# Allegro board A527_draft_V1_0.brd
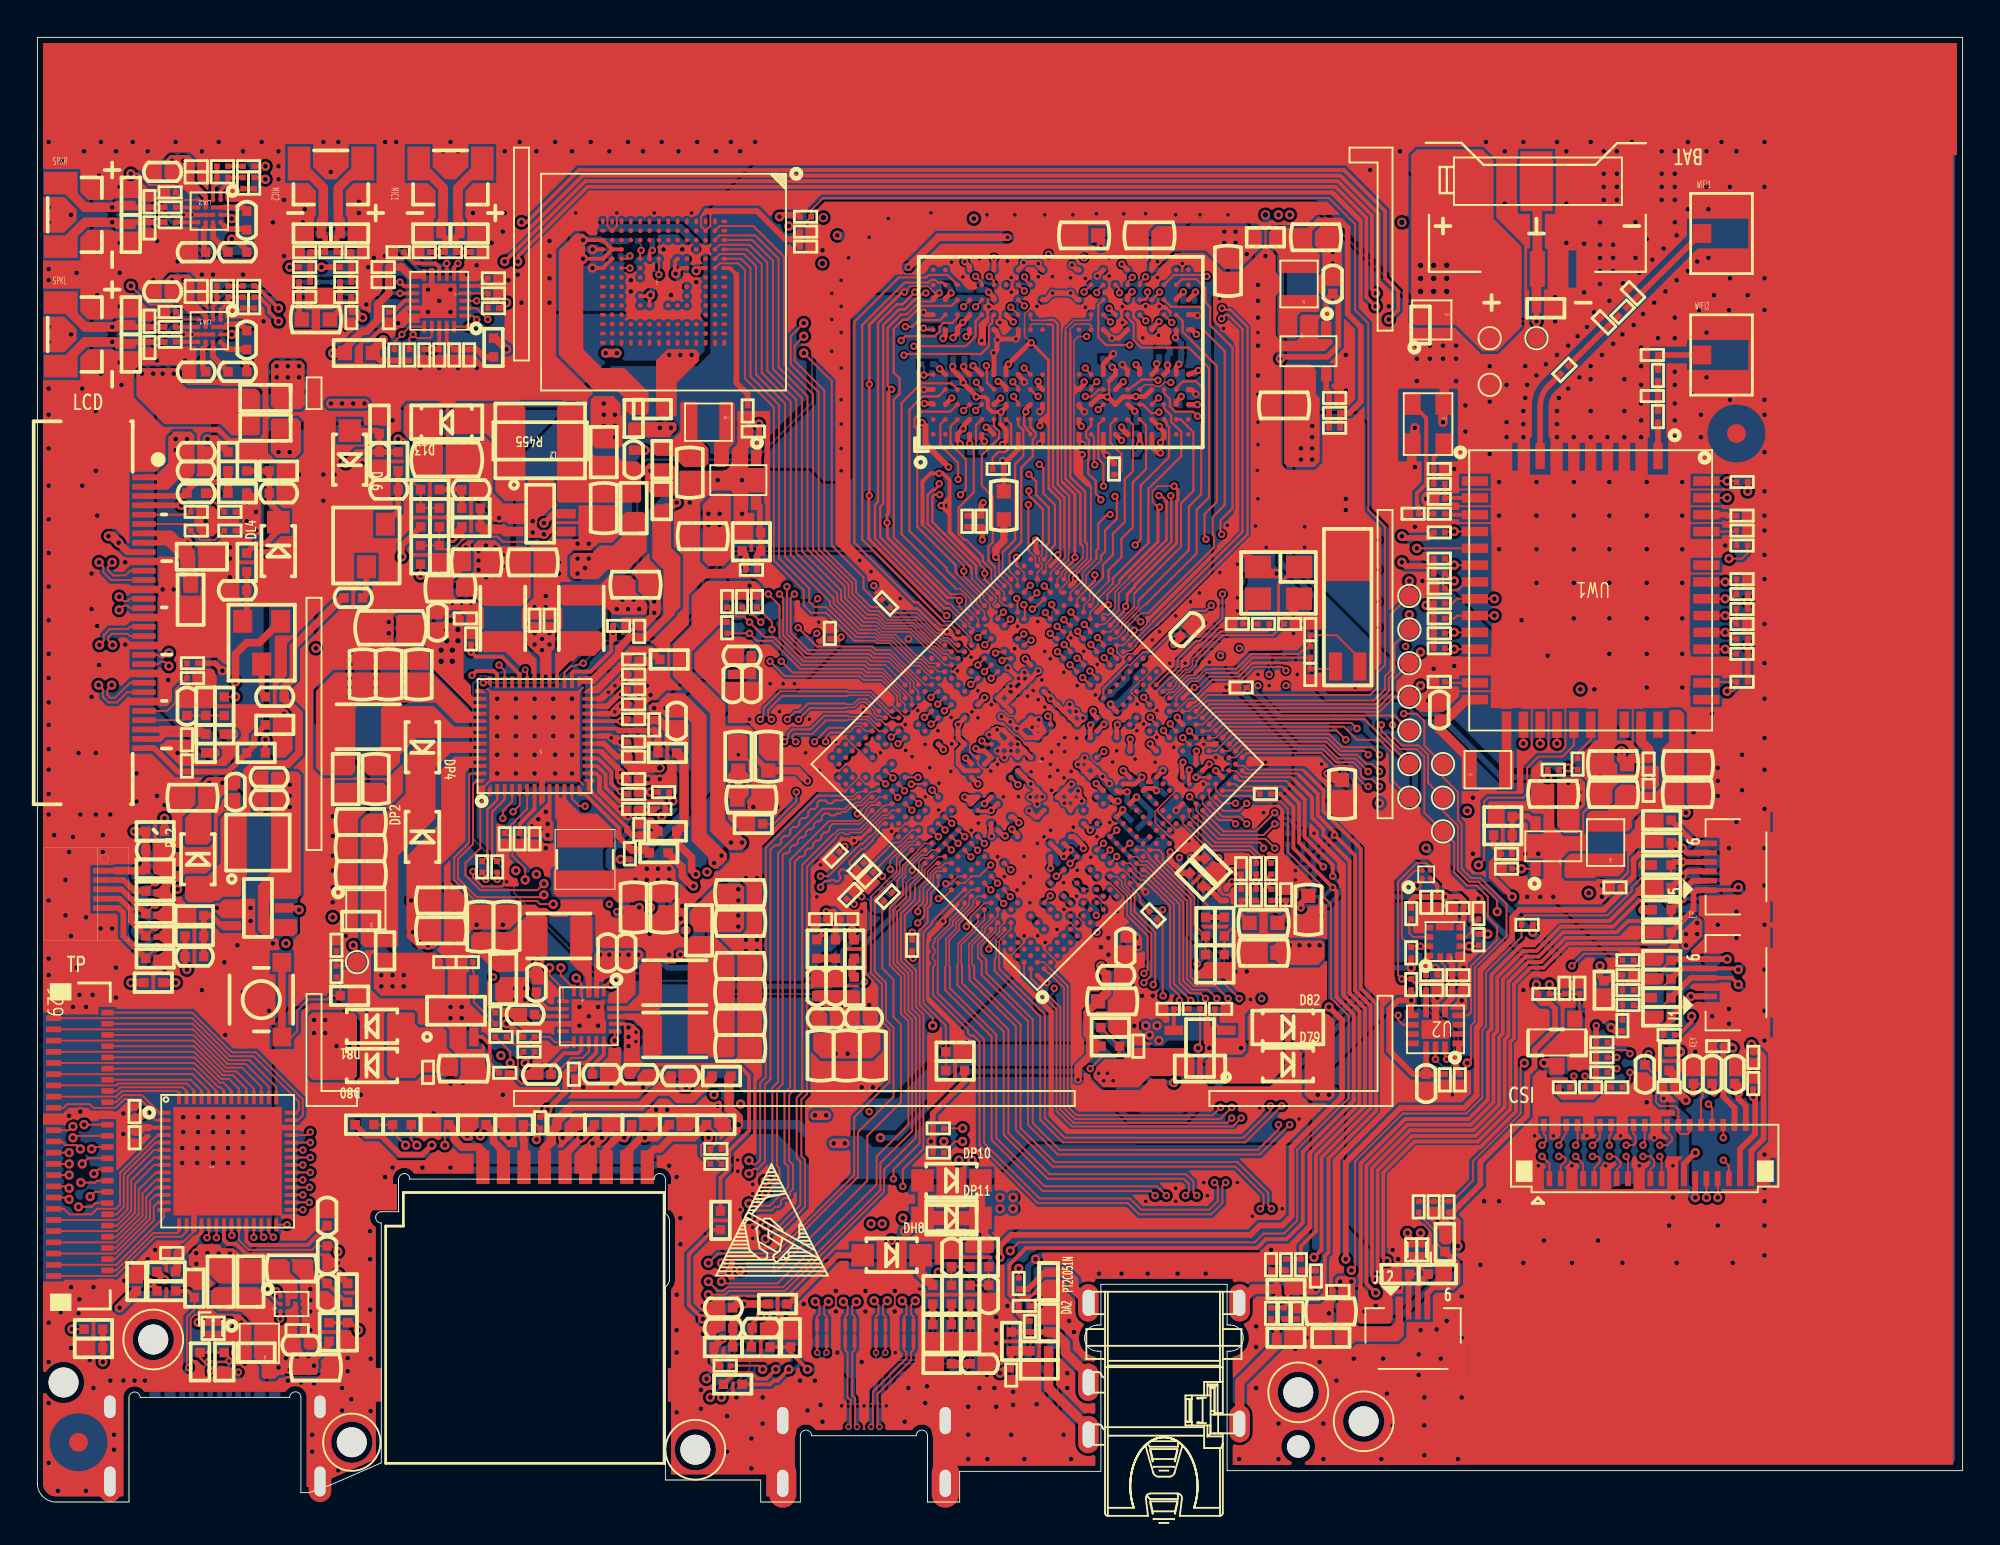
[diagram p0: board, top side]
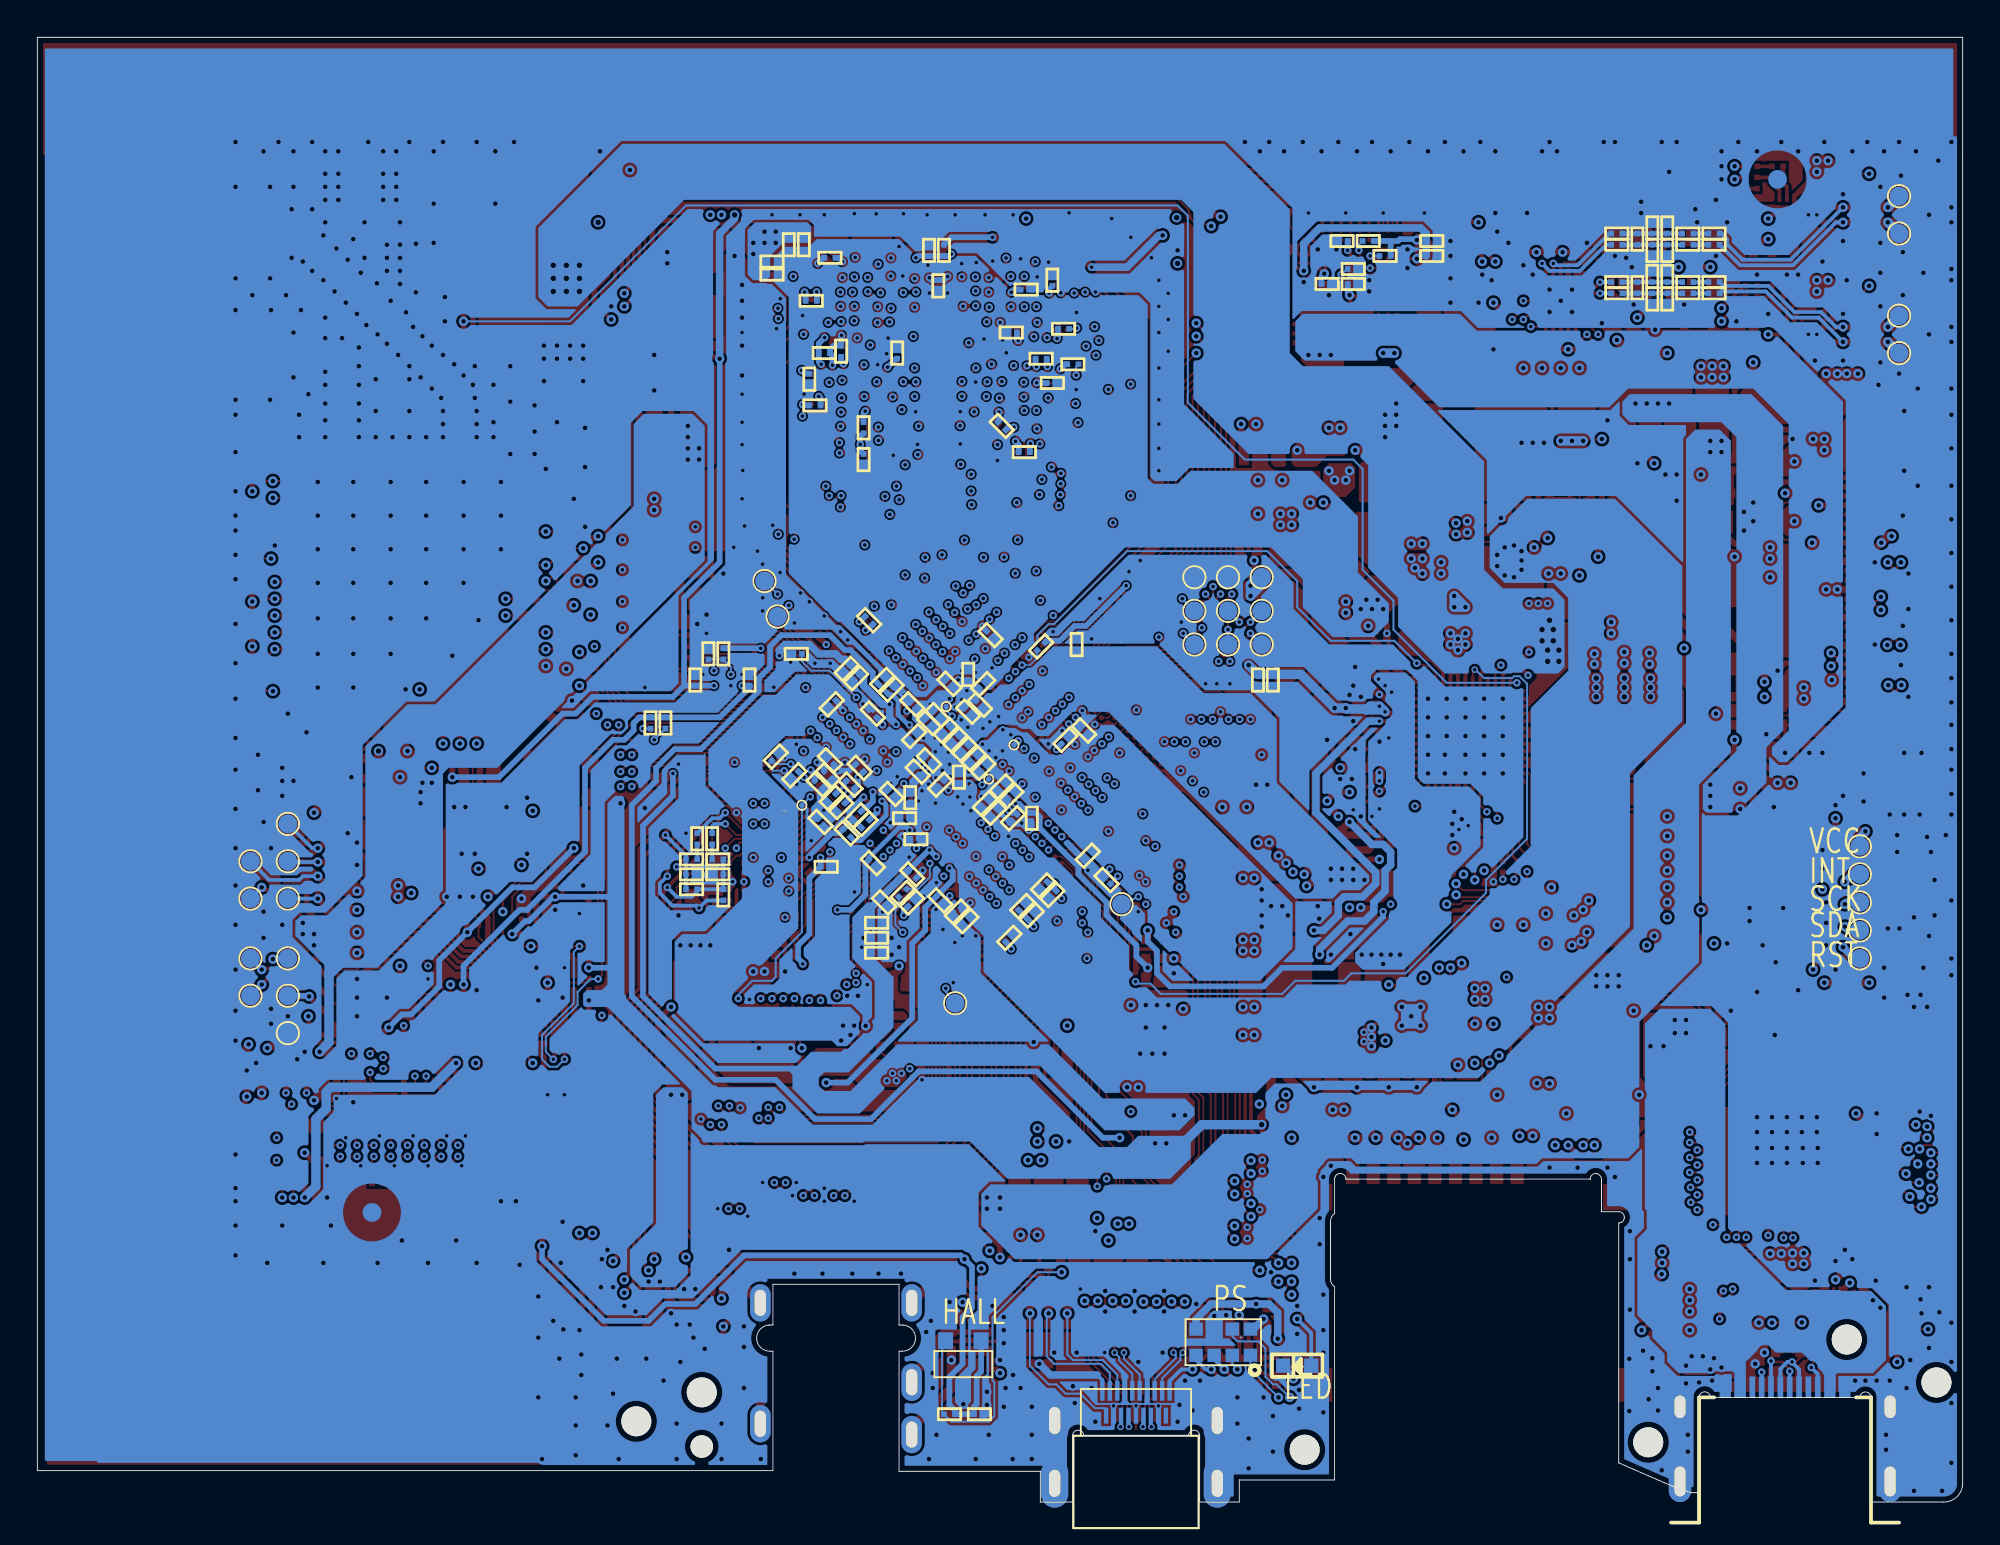
[diagram p1: board, bottom side, seen from below]

Outline 103 x 78.4 mm; copper layers: TOP, ART02, ART03, ART04, ART05, BOTTOM. Coordinates in mm from the lower left corner of the outline.
Outline path: 0,71.9 0,1 arc(0.29,0.29) 1,0 4.9,0 4.9,5.6 arc(5.2,5.89) 5.5,5.6 13.5,5.6 arc(13.8,5.9) 14.1,5.6 14.1,0.5 14.52,0.5 15.72,0.93 18.4,2.1 18.4,14.94 arc(18.19,15.03) 18.1,15.24 arc(18.19,15.45) 18.4,15.54 19.32,15.54 19.32,17.28 arc(19.4,17.48) 19.6,17.58 arc(19.82,17.52) 19.92,17.3 19.92,17.28 33,17.28 33,17.31 arc(33.09,17.51) 33.29,17.58 arc(33.51,17.5) 33.6,17.28 33.6,15.44 arc(33.76,15.26) 33.82,15.03 33.82,11.94 arc(33.76,11.7) 33.6,11.52 33.6,1.18 38.7,1.18 38.7,0 40.82,0 40.82,3.55 arc(41.09,3.85) 41.41,3.6 arc(41.42,3.58) 41.42,3.55 47.02,3.55 arc(47.05,3.68) 47.14,3.79 arc(47.45,3.82) 47.62,3.55 47.62,0 49.34,0 49.34,1.64 56.9,1.64 56.9,8.07 56.72,8.07 arc(56.02,8.75) 56.66,9.47 56.72,9.47 56.9,9.47 56.9,11.66 63.65,11.66 63.65,9.48 63.81,9.48 63.82,9.47 arc(64.52,8.77) 63.82,8.07 63.65,8.07 63.65,1.68 103,1.68 103,78.4 0,78.4 0,71.9

## Design rules (mm)
net group DIFFPAIR9: nets USB0-DM USB0-DP
net group DIFFPAIR15: nets USB1-DM USB1-DP
net group DIFFPAIR17: nets MCSIB-D1N MCSIB-D1P
net group DIFFPAIR18: nets MCSIA-D1N MCSIA-D1P
net group DIFFPAIR21: nets MCSIA-D0N MCSIA-D0P
net group DIFFPAIR23: nets MCSIB-D0N MCSIB-D0P
net group DIFFPAIR24: nets HTX2N HTX2P
net group DIFFPAIR25: nets HTX1N HTX1P
net group DIFFPAIR26: nets HTX0N HTX0P
net group DIFFPAIR27: nets HTXCN HTXCP
net group DIFFPAIR28: nets MCSIA-CKN MCSIA-CKP
net group DIFFPAIR29: nets MCSIC-D0N MCSIC-D0P
net group DIFFPAIR30: nets MCSIC-D1N MCSIC-D1P
net group DIFFPAIR31: nets MCSIC-CKN MCSIC-CKP
net group DIFFPAIR32: nets MIPI-DSI1-DN3 MIPI-DSI1-DP3
net group DIFFPAIR33: nets MIPI-DSI1-DN2 MIPI-DSI1-DP2
net group DIFFPAIR34: nets MIPI-DSI1-CKN MIPI-DSI1-CKP
net group DIFFPAIR35: nets MIPI-DSI1-DN1 MIPI-DSI1-DP1
net group DIFFPAIR36: nets MIPI-DSI1-DN0 MIPI-DSI1-DP0
net group DIFFPAIR37: nets N1092981 N1092985
net group DIFFPAIR38: nets D+ D-
net group SDQS0: nets SDQS0N SDQS0P
net group SDQS1: nets SDQS1N SDQS1P
net group SDQS2: nets SDQS2N SDQS2P
net group SDQS3: nets SDQS3N SDQS3P

## Placement (name value [footprint] x y rotation side)
BL1  GZ1005D471CTF  [L0402]  6.3 35.9 180 top
C1  2.2uF  [C0201]  57.3 43.5 135 bottom
C2  100nF  [C0201]  57.8 44 135 bottom
C3  22uF  [C0603]  37.6 32.6 0 top
C4  2.2uF  [C0201]  52.9 39.8 315 bottom
C5  2.2uF  [C0201]  47 41.3 45 bottom
C6  100nF  [C0201]  50.9 37.8 315 bottom
C7  22uF  [C0603]  37.6 31 0 top
C8  1uF  [C0201]  52.4 39.3 315 bottom
C9  2.2uF  [C0201]  46.8 34.6 315 bottom
C10  NC/100nF  [C0201]  51.4 38.3 315 bottom
C11  22uF  [C0603]  37.5 39.9 90 top
C12  22uF  [C0603]  38.2 37.6 0 top
C13  2.2uF  [C0201]  53.2 42.3 45 bottom
C14  2.2uF  [C0201]  52.57 42.67 45 bottom
C15  1uF  [C0201]  47.4 45.9 90 bottom
C16  NC/1uF  [C0201]  54.4 41.3 315 bottom
C17  2.2uF  [C0201]  53.9 40.8 315 bottom
C18  NC/100nF  [C0201]  53.4 40.3 315 bottom
C19  100nF  [C0201]  37.7 44 270 bottom
C20  100nF  [C0201]  58.3 42.2 45 bottom
C21  1uF  [C0201]  59.2 44.1 315 bottom
C22  100nF  [C0201]  59.7 44.6 315 bottom
C23  1nF  [C0201]  64.4 43.6 180 top
C24  1nF  [C0201]  67.1 45.4 90 bottom
C25  22uF  [C0603]  44.7 23.9 270 top
C26  2.2uF  [C0201]  53.3 31.1 315 bottom
C27  2.2uF  [C0201]  53.8 31.6 315 bottom
C28  NC/100nF  [C0201]  52.3 37.4 135 bottom
C29  NC/100nF  [C0201]  51.8 36.9 135 bottom
C30  18pF-C0G  [C0201]  67 47 0 top
C31  22pF-C0G  [C0201]  68.1 46.7 90 top
C32  22uF  [C0603]  41.9 23.9 270 top
C33  100nF  [C0201]  49.8 31.4 315 bottom
C34  18pF-C0G  [C0201]  64.2 47 180 top
C35  22pF-C0G  [C0201]  68.1 44.3 270 top
C36  22uF  [C0603]  43.3 23.9 270 top
C37  2.2uF  [C0201]  56.3 37.7 90 bottom
C38  22uF  [C0603]  22.1 48.9 180 top
C39  NC/2.2uF  [C0201]  53.7 38.8 90 bottom
C40  2.2uF  [C0201]  56 35.48 0 bottom
C41  NC/100nF  [C0201]  54.7 38.4 135 bottom
C42  2.2uF  [C0201]  56.6 36.6 0 bottom
C43  22uF  [C0603]  65.6 29.4 180 top
C44  2.2uF  [C0201]  55.9 39.1 225 bottom
C45  2.2uF  [C0201]  57.3 37.9 225 bottom
C46  2.2uF  [C0201]  55.3 39.7 225 bottom
C47  2.2uF  [C0201]  56.1 41 135 bottom
C48  100nF  [C0201]  42.4 46.5 90 top
C49  10uF  [C0603]  39.1 39.9 90 top
C50  100nF  [C0201]  48 40.8 135 bottom
C51  100nF  [C0201]  36.9 44 270 bottom
C52  100nF  [C0201]  54.7 32.2 225 bottom
C54  100nF  [C0201]  58.3 34.2 225 bottom
C55  1uF  [C0201]  41.9 31.2 180 top
C56  100nF  [C0201]  43.3 31.2 0 top
C57  100nF  [C0201]  56.2 33.6 225 bottom
C58  100nF  [C0201]  58.1 30.2 180 bottom
C59  100nF  [C0201]  64.9 44 90 bottom
C60  100nF  [C0201]  67.8 44 90 bottom
C61  100nF  [C0201]  60.8 34 180 bottom
C62  2.2uF  [C0201]  60.6 39.7 45 bottom
C63  2.2uF  [C0201]  60 37.2 315 bottom
C64  470nF  [C0201]  60.7 38.9 225 bottom
C65  470nF  [C0201]  61.2 38.4 225 bottom
C66  470nF  [C0201]  60.5 37.7 315 bottom
C67  470nF  [C0201]  59.7 35.8 45 bottom
C68  2.2uF  [C0201]  59.15 36.75 315 bottom
C69  10uF  [C0603]  69.8 37.9 270 top
C70  2.2uF  [C0201]  62.5 38.9 315 bottom
C71  2.2uF  [C0201]  63.5 39.9 135 bottom
C72  100nF  [C0201]  46.8 29.8 270 top
C73  100nF  [C0201]  49.8 36.6 270 bottom
C78  1uF  [C0201]  58.1 31 180 bottom
C79  1uF  [C0201]  57.7 32.1 225 bottom
C80  100nF  [C0201]  56.2 32.1 135 bottom
C81  100nF  [C0201]  58.1 29.4 180 bottom
C82  1uF  [C0201]  51 30.2 315 bottom
C83  1uF  [C0201]  50.3 31.9 315 bottom
C84  100nF  [C0201]  49.2 33 135 bottom
C85  100nF  [C0201]  48.7 32.5 135 bottom
C90  1nF  [C0201]  85.1 28.2 0 top
C91  10nF  [C0201]  76 27.4 0 top
C92  100nF  [C0201]  75.3 22.6 270 top
C93  2.2uF  [C0402]  74.3 22.9 270 top
C94  100nF  [C0201]  52.6 4.7 180 bottom
C95  NC/2.2uF  [C0402]  37.2 9.3 180 top
C96  1uF  [C0201]  74.3 32.1 270 top
C97  100nF  [C0201]  74.9 32.1 270 top
C98  NC/2.2uF  [C0402]  37.2 10.4 180 top
C100  100nF  [C0201]  76 28.2 0 top
C101  100nF  [C0201]  76 31.8 180 top
C102  NC/100nF  [C0201]  50.8 36.6 315 bottom
C103  100nF  [C0201]  60.5 42.7 135 bottom
C104  100nF  [C0402]  61.15 46.35 45 top
C105  10uF  [C0603]  57.5 26.8 0 top
C106  100nF  [C0402]  57.2 28.2 0 top
C107  100nF  [C0402]  58.2 30.2 270 top
C108  1uF  [C0402]  43.7 25.9 0 top
C109  1uF  [C0402]  41.7 27.1 90 top
C110  100nF  [C0402]  42.7 27.1 90 top
C111  100nF  [C0402]  42.7 25.9 180 top
C112  100nF  [C0402]  34.2 42.3 270 top
C113  100nF  [C0402]  38.2 44.3 270 top
C114  1uF  [C0402]  38.2 45.3 180 top
C115  1uF  [C0402]  37.2 44.3 270 top
C133  2.2uF  [C0201]  58.7 36.3 315 bottom
C651  0.1uF/50V  [C0402]  9 55.2 180 top
CA1  2.2uF  [C0603]  68 31.7 270 top
CA2  100nF  [C0201]  66.9 35.5 270 bottom
CA3  33pF  [C0201]  68 32.8 0 bottom
CA4  100nF  [C0201]  67.7 35.5 270 bottom
CA5  100nF  [C0201]  66.7 10.1 270 top
CA6  100nF  [C0201]  67.6 12.7 270 top
CA7  NC/33pF  [C0201]  68 33.6 180 bottom
CA8  1nF  [C0201]  66.6 33.6 0 bottom
CA9  NC/100nF  [C0201]  8.5 71.5 0 top
CA10  2.2uF/10V  [C0402]  10.2 66.9 0 top
CA11  2.2uF/10V  [C0402]  11.2 68.1 90 top
CA12  4.7uF/10V  [C0402]  7.2 64.8 180 top
CA13  100nF  [C0201]  8.5 65.1 0 top
CA14  NC/100nF  [C0201]  8.5 64.5 0 top
CA15  2.2uF/10V  [C0402]  11.2 61.7 90 top
CA16  4.7uF/10V  [C0402]  7.2 71.2 180 top
CA17  100nF  [C0201]  8.5 70.9 0 top
CA18  2.2uF/10V  [C0402]  10.2 60.5 0 top
CA19  4.7uF-10V  [C0402]  8 60.5 0 top
CA20  4.7uF-10V  [C0402]  8 66.9 0 top
CA21  100nF  [C0201]  11.3 65.1 0 top
CA22  100nF  [C0201]  11.3 71.5 0 top
CA23  100nF  [C0201]  11.6 64.2 90 top
CA24  100nF  [C0201]  11.6 70.6 90 top
CA25  220pF  [C0201]  9.9 64.5 180 top
CA26  NC/1nF  [C0201]  6 68.2 270 top
CA27  NC/1nF  [C0201]  6 69.6 90 top
CA28  220pF  [C0201]  9.9 70.9 180 top
CA29  NC/1nF  [C0201]  6 61.8 270 top
CA30  NC/1nF  [C0201]  6 63.2 90 top
CA31  33pF  [C0201]  23.5 66.9 180 top
CA32  1uF  [C0201]  64.4 33.9 270 top
CA33  1uF  [C0201]  16.8 63.4 90 top
CA34  33pF  [C0201]  17.1 66.9 180 top
CA35  100nF  [C0201]  65.2 33.9 270 top
CA36  100nF  [C0201]  16.5 66.1 0 top
CA37  100pF  [C0201]  22.1 66.9 180 top
CA38  10uF  [C0603]  65.6 31 0 top
CA39  100pF  [C0201]  15.7 66.9 180 top
CA40  10uF  [C0603]  14.9 63.3 180 top
CA41  100nF  [C0201]  66 33.9 270 top
CA42  100nF  [C0201]  14.3 66.1 0 top
CA43  33pF  [C0201]  20.7 66.9 180 top
CA44  33pF  [C0201]  14.3 66.9 180 top
CA45  1uF  [C0201]  22.3 61.4 270 top
CA46  100nF  [C0201]  23.1 61.4 270 top
CA47  1uF  [C0201]  21.5 61.4 270 top
CA48  100nF  [C0201]  20.7 61.4 270 top
CA49  100nF  [C0201]  24.4 64.7 0 top
CA50  1uF  [C0201]  24.4 65.5 0 top
CA51  1uF  [C0201]  18.8 63.4 270 top
CA52  1uF  [C0201]  19.3 66.9 180 top
CA53  1uF  [C0201]  18.5 66.1 180 top
CA54  100nF  [C0201]  18.5 65.3 180 top
CA55  10nF  [C0201]  16.6 68.2 270 bottom
CA56  470nF  [C0201]  18.5 67.9 0 bottom
CA57  0R  [C0201]  13.3 67.9 0 bottom
CA58  NC  [C0201]  17.4 67.6 270 bottom
CA59  470nF  [C0201]  18.5 67.3 0 bottom
CA60  0R  [C0201]  13.3 67.3 0 bottom
CA61  10nF  [C0201]  16.6 67 270 bottom
CA62  10nF  [C0201]  15.8 65.6 270 bottom
CA63  470nF  [C0201]  18.5 65.3 0 bottom
CA64  0R  [C0201]  13.3 65.3 0 bottom
CA65  NC  [C0201]  17.4 65 270 bottom
CA66  470nF  [C0201]  18.5 64.7 0 bottom
CA67  0R  [C0201]  13.3 64.7 0 bottom
CA68  10nF  [C0201]  15.8 64.4 270 bottom
CC1  4.7uF  [C0402]  33.9 22.8 0 top
CD1  10uF  [C0603]  51.7 53.35 270 top
CD2  2.2uF  [C0201]  54.8 65.1 90 bottom
CD3  2.2uF  [C0201]  48.7 59.9 0 bottom
CD4  2.2uF  [C0201]  61.7 60.1 90 bottom
CD5  2.2uF  [C0201]  50.9 62.6 180 bottom
CD6  2.2uF  [C0201]  58.8 55.8 90 bottom
CD7  2.2uF  [C0201]  57 61.5 270 bottom
CD8  2.2uF  [C0201]  60.6 66.6 0 bottom
CD9  100nF  [C0201]  49.3 61.2 180 bottom
CD10  100nF  [C0201]  50.2 56.2 0 bottom
CD11  100nF  [C0201]  58.8 57.5 270 bottom
CD12  10uF  [C0603]  56 67.8 180 top
CD13  2.2uF  [C0201]  54.2 43.8 225 bottom
CD14  2.2uF  [C0201]  52 46.4 45 bottom
CD15  2.2uF  [C0201]  53.2 44.3 270 bottom
CD16  100nF  [C0201]  52.4 43.77 315 bottom
CD17  2.2uF  [C0201]  50.5 52.5 90 top
CD18  100nF  [C0201]  49.75 52.5 90 top
CD19  10uF  [C0603]  59.5 67.8 180 top
CD20  2.2uF  [C0201]  60 61.6 90 bottom
CD21  2.2uF  [C0201]  61.6 64.3 0 bottom
CD22  2.2uF  [C0201]  48.7 65.4 90 bottom
CD23  2.2uF  [C0201]  61.4 58.7 0 bottom
CD24  2.2uF  [C0201]  60.9 61.5 180 bottom
CD25  2.2uF  [C0201]  50.1 64.9 180 bottom
CD26  2.2uF  [C0201]  51.4 57.6 45 bottom
CD27  100nF  [C0201]  55.3 67 90 bottom
CD28  10uF  [C0603]  63.7 65.9 270 top
CD29  2.2uF  [C0201]  54.85 42.13 225 bottom
CD30  2.2uF  [C0201]  55.3 41.7 225 bottom
CD31  2.2uF  [C0201]  56.2 42.7 45 bottom
CD32  2.2uF  [C0201]  58.5 47.2 225 bottom
CD33  100pF  [C0201]  69.4 58.3 180 top
CD34  10uF/10V  [C0603]  66.7 58.7 180 top
CD35  10uF  [C0603]  68.4 67.7 0 top
CD36  NC  [C0402]  69.3 64.7 90 top
CH1  100nF-16V  [C0402]  39.25 9.32 180 top
CH2  NC/pF  [C0402]  50.9 10.6 90 top
CH3  NC/pF  [C0402]  48.9 13.6 270 top
CH4  100nF-10V  [C0402]  50.9 7.4 180 top
CL2  10nF  [C0201]  8 39.4 90 top
CL3  1uF  [C0402]  8 54 0 top
CL4  1uF  [C0201]  8 40.8 270 top
CL5  100nF-25V  [C0402]  10.6 37.5 90 top
CL6  4.7uF/10V  [C0603]  30.3 53.2 270 top
CL7  100nF  [C0402]  31.9 55.3 90 top
CL8  4.7uF-50V  [C0805]  20.9 55.8 0 top
CL9  100nF-50V  [C0402]  8 56.2 0 top
CL10  4.7uF  [C0402]  12.9 38.8 180 top
CL11  1nF  [C0402]  12.9 37.6 180 top
CL12  10nF/25V  [C0402]  7.9 29.2 0 top
CL13  100nF-25V  [C0402]  12.2 43.1 0 top
CL14  100nF-25V  [C0402]  16.4 48.4 0 top
CL15  10uF-16V  [C0603]  8.3 37.7 180 top
CL16  100nF-25V  [C0402]  11.2 48.8 180 top
CL17  100nF-25V  [C0402]  12.4 54 0 top
CL18  100nF-25V  [C0402]  19.3 54.2 180 top
CL19  NC/1uF  [C0402]  22.7 54.2 0 top
CL20  100nF-25V  [C0402]  18.3 56.2 270 top
CL21  100nF  [C0201]  5.2 20.9 90 top
CL22  1uF  [C0201]  5.2 19.5 270 top
CL25  2.2uF  [C0402]  5.8 34.9 0 top
CL27  NC  [C0402]  15.5 13.7 270 top
CL28  NC  [C0402]  8 42.1 90 top
CL29  1uF  [C0201]  7.19 13.33 180 top
CL30  1uF  [C0402]  15.5 14.8 90 top
CL31  2.2uF  [C0402]  15.5 11.7 270 top
CM1  100nF  [C0201]  32.6 65.2 180 bottom
CM2  1uF  [C0201]  28.4 66.7 180 bottom
CM3  1uF  [C0201]  41.1 67.2 0 top
CM4  100nF  [C0201]  41.1 68 0 top
CM6  1uF  [C0201]  34 65.2 180 bottom
CM8  100nF  [C0201]  28.4 67.5 180 bottom
CON2  HDMI_19plug type D  [HDMI_TYPE_D_CB10]  44.23 1 180 bottom
CP1  100nF  [C0201]  25 35.5 270 top
CP2  1uF/10V  [C0201]  26.6 35.5 270 top
CP3  22uF  [C0603]  23.5 50.3 180 top
CP4  10uF/10V  [C0603]  21.6 32.2 180 top
CP5  22uF  [C0603]  31.9 31.83 270 top
CP6  22uF  [C0603]  33.5 31.83 270 top
CP7  1uF/10V  [C0201]  26.6 47.2 90 top
CP8  22uF  [C0603]  26.5 50.3 0 top
CP9  NC/10uF  [C0603]  21.6 30.6 180 top
CP10  22uF/10V  [C0603]  17.3 36.4 0 top
CP11  1uF/10V  [C0201]  27.4 47.2 90 top
CP12  10uF/10V  [C0603]  17.3 35 0 top
CP13  NC/10uF  [C0603]  17.3 33.6 0 top
CP15  22uF  [C0603]  32 49.1 0 top
CP16  22uF/10V  [C0603]  20.4 44.3 270 top
CP17  NC  [C0603]  18.1 38.7 90 top
CP18  22uF/10V  [C0603]  17.4 44.3 270 top
CP19  22uF/10V  [C0603]  18.8 44.3 270 top
CP20  2.2uF  [C0201]  31.1 46.9 0 top
CP22  4.7uF/10V  [C0402]  21.4 46.6 90 top
CP23  1uF  [C0201]  25.8 35.5 270 top
CP24  100nF  [C0201]  22.9 47.3 0 top
CP25  1uF  [C0201]  23.2 46.2 90 top
CP26  1uF/10V  [C0201]  31.9 37.1 0 top
CP27  2.2uF  [C0201]  31.7 34.7 270 top
CP28  2.2uF  [C0201]  32.2 36 90 top
CP31  2.2uF  [C0201]  33.3 37.1 180 top
CP32  2.2uF  [C0201]  31.9 37.9 0 top
CP33  1uF/10V  [C0201]  31.9 40.7 0 top
CP34  1uF/10V  [C0201]  31.9 44.3 0 top
CP35  2.2uF  [C0201]  31.9 38.7 0 top
CP36  2.2uF  [C0201]  31.9 42.7 0 top
CP37  2.2uF  [C0201]  31.9 39.9 0 top
CP38  2.2uF  [C0201]  31.9 43.5 0 top
CP39  2.2uF  [C0201]  33 41.6 90 top
CP40  2.2uF  [C0201]  31.9 45.1 0 top
CP41  2.2uF  [C0201]  31.9 41.9 0 top
CP42  2.2uF  [C0201]  32.2 46.6 90 top
CP49  10uF/10V  [C0603]  81.1 37.9 180 top
CP50  10uF  [C0603]  84.3 37.9 180 top
CP51  100pF  [C0201]  78.6 34.7 180 top
CP53  10uF/10V  [C0603]  35.6 51.7 180 top
CP54  100pF  [C0201]  38.2 49.9 180 top
CP56  10uF  [C0603]  34.9 55.1 270 top
CP59  100nF  [C0201]  20.9 23 90 top
CP61  1uF/10V  [C0201]  21.8 28.9 180 top
CP62  10uF/10V  [C0603]  22.8 23.2 180 top
CP65  100nF-10V  [C0402]  13.6 8.4 0 top
CP66  10uF/10V  [C0603]  13.6 12.5 0 top
CP67  NC/100nF  [C0201]  38.3 57.3 0 top
CP68  NC  [C0805]  19.9 46.8 180 top
CP69  NC  [C0201]  16 29.8 270 top
CP135  1uF/6.3V  [C0402]  26.6 26.1 180 top
CP136  4.7uF/6.3V  [C0402]  29.7 22.9 0 top
CP137  4.7uF/6.3V  [C0402]  27.47 22.87 180 top
CP138  4.7uF/6.3V  [C0402]  26.7 27.3 90 top
CP139  4.7uF/10V  [C0402]  30.5 28.9 90 top
CP140  NC/22uF/6.3V  [C0603]  37.6 25.7 0 top
CP141  10uF/6.3V  [C0603]  37.6 27.3 0 top
CP143  NC/22uF/6.3V  [C0603]  37.6 24.3 0 top
CP144  10uF/6.3V  [C0603]  37.6 28.7 0 top
CP145  4.7uF/6.3V  [C0402]  31.5 28.9 90 top
CP146  4.7uF/10V  [C0402]  31.7 22.9 0 top
CP147  NC/22uF/6.3V  [C0603]  25.1 30.8 90 top
CP148  10uF/6.3V  [C0603]  23.7 30.8 90 top
CP149  NC/100nF  [C0201]  28.7 22.9 270 top
CU3  10uF-10V  [C0603]  14.9 7.2 0 top
CU4  1uF/10V  [C0201]  13.9 9.2 0 top
CU5  1uF/10V  [C0201]  58.9 24.4 270 top
CU6  10uF/10V  [C0603]  69.2 10.2 0 top
CU11  0.1uF  [C0201]  69.58 11.3 0 top
CV1  2.2uF  [C0201]  89.9 24.4 180 top
CV2  4.7uF  [C0402]  90.8 22.4 90 top
CV3  1uF  [C0201]  91.8 23.8 270 top
CV4  1uF  [C0201]  91.8 22.4 90 top
CV5  NC  [C0402]  86 23.4 270 top
CV6  100nF  [C0201]  87.3 22.2 180 top
CV7  100nF  [C0201]  82.5 27.5 90 top
CV8  NC  [C0402]  88.6 22.4 90 top
CV9  NC  [C0402]  89.6 22.4 90 top
CW1  NC  [C0201]  85.37 64.7 135 top
CW2  NC  [C0201]  86.4 61.4 0 top
CW3  10pF  [C0201]  84.8 63.71 225 top
CW4  10pF  [C0201]  86.7 60.3 270 top
CW5  NC  [C0201]  83.81 63.15 135 top
CW6  NC  [C0201]  86.4 59.2 0 top
CW8  NC/33pF  [C0201]  75 48.9 0 top
CW14  NC/22pF  [C0201]  75 55.3 0 top
CW15  NC/22pF  [C0201]  73.6 52.9 180 top
CW16  NC/4.7uF  [C0402]  75 42.9 270 top
CW17  100nF  [C0201]  86.2 39.5 90 top
CW18  10uF  [C0603]  84.3 39.5 180 top
CW19  100nF  [C0201]  86.2 38.1 270 top
CW20  10uF  [C0603]  88.3 39.5 0 top
CW21  10uF  [C0603]  88.3 37.9 0 top
D2  PT2C051N  [ESD0402]  83.8 26.9 90 top
D3  PT2C051N  [ESD0402]  86.4 28 0 top
D4  PT2C051N  [ESD0402]  86.4 27 0 top
D5  PT2C051N  [ESD0402]  86.4 29 0 top
D6  PT2C051N  [ESD0402]  86.4 26 0 top
D13  SDK34  [SOD_123_G]  21.9 57.79 180 top
D79  SDK24  [SOD_123_G]  66.9 23.41 0 top
D80  SDK24/NC  [SOD_123_G]  17.9 23.37 180 top
D81  SDK24/NC  [SOD_123_G]  17.9 25.47 180 top
D82  SDK24  [SOD_123_G]  66.9 25.41 0 top
D83  PT2C051N  [ESD0402]  17.2 27.1 180 top
DA1  PT2C051N  [ESD0402]  67.3 11.4 180 top
DA2  PT2C051N  [ESD0402]  54.1 11.3 90 top
DA3  PT2C051N  [ESD0402]  67.3 8.8 180 top
DA4  PT2C051N  [ESD0402]  53.1 7.1 0 top
DA5  NC/PT2C051N  [ESD0402]  54.1 10.1 270 top
DA6  PT2C051N  [ESD0402]  5 67.4 90 top
DA7  PT2C051N  [ESD0402]  5 70.4 270 top
DA8  PT2C051N  [ESD0402]  5 61 90 top
DA9  PT2C051N  [ESD0402]  5 64 270 top
DA10  PT2C051N  [ESD0402]  20.6 67.9 0 top
DA11  PT2C051N  [ESD0402]  23.6 67.9 180 top
DA12  PT2C051N  [ESD0402]  14.2 67.9 0 top
DA13  PT2C051N  [ESD0402]  17.2 67.9 180 top
DA14  PT2C051N  [ESD0402]  86.4 35.3 0 top
DA15  PT2C051N  [ESD0402]  86.4 31.7 0 top
DA16  PT2C051N  [ESD0402]  86.4 32.9 0 top
DA17  PT2C051N  [ESD0402]  86.4 34.1 0 top
DA18  PT2C051N  [ESD0402]  86.4 30.5 0 top
DC1  PT2C051U  [ESD0402]  34.8 20.2 180 top
DC2  PT2C051U  [ESD0402]  32.8 20.2 180 top
DC3  PT2C051U  [ESD0402]  30.8 20.2 180 top
DC4  PT2C051N  [ESD0402]  36.8 20.2 180 top
DC5  PT2C051N  [ESD0402]  28.8 20.2 180 top
DC6  PT2C051N  [ESD0402]  25 20.2 0 top
DC7  PT2C051U  [ESD0402]  23 20.2 0 top
DC8  PT2C051U  [ESD0402]  21 20.2 0 top
DH1  AZ1345-04F  [RCLAMP0524P]  41.72 9.47 0 top
DH2  AZ1345-04F  [RCLAMP0524P]  44.87 9.47 0 top
DH3  ESD9B5VL-2-TR  [ESD0402]  40.3 9.3 270 top
DH4  ESD9B5VL-2-TR  [ESD0402]  49.9 8.5 90 top
DH5  ESD9B5VL-2-TR  [ESD0402]  48.9 8.5 90 top
DH6  ESD9B5VL-2-TR  [ESD0402]  47.9 8.5 90 top
DH7  ESD5451X-2/TR  [ESD0402]  47.9 7.4 0 top
DH8  SDK24  [SOD_123_G]  45.7 13.21 0 top
DL2  DSK34  [SOD_123_G]  8.59 34.4 90 top
DL3  BAT54S  [SOT23-132]  12 46 180 top
DL4  18V  [SOD123]  12.89 50.9 90 top
DL5  BAT54S  [SOT23-132]  17.6 51.2 180 top
DL6  6.2V  [SOD123]  16.71 55.8 270 top
DL7  PT2C051N  [ESD0402]  6.8 32.7 180 top
DL8  PT2C051N  [ESD0402]  6.8 31.5 180 top
DL9  PT2C051N  [ESD0402]  6.8 30.3 180 top
DL10  PT2C051N  [ESD0402]  6.8 29.1 180 top
DL11  PT2C051N  [ESD0402]  6.8 33.9 180 top
DP1  PTVSHC3N4V5B  [DFN3P130B200_200H65]  74.6 63.27 180 top
DP2  NC  [SOD123]  20.6 35.6 90 top
DP4  NC  [SOD123]  20.6 40.4 270 top
DP5  LED  [LED0603]  34.85 7.3 0 bottom
DP6  NC/PTVSHC3N12VU  [DFN3P130B200_200H65]  17.58 31.7 90 top
DP10  SDK24  [SOD_123_G]  48.9 17.21 0 top
DP11  SDK24  [SOD_123_G]  48.9 15.21 0 top
DU2  PT2C051U  [ESD0402]  8.7 7 90 top
DU3  PT2C051U  [ESD0402]  10 7 90 top
DU5  PT2C051N  [ESD0402]  2.5 8.25 0 top
DU6  PT2C051N  [ESD0402]  8.4 11.95 270 top
DU8  PTVSHC3N24VUH  [DFN3P130B200_200H65]  11.88 8.5 90 top
DU9  PT2C051N  [ESD0402]  75.3 14.4 270 top
DU10  PT2C051U  [ESD0402]  75.4 12.2 180 top
DU11  PT2C051U  [ESD0402]  72.4 12.2 0 top
DU12  PT2C051N  [ESD0402]  68.7 8.8 0 top
DU13  NC  [ESD0402]  11.2 8 0 top
DU14  NC  [ESD0402]  16.8 31.1 0 top
DU15  NC  [ESD0402]  74 62.5 90 top
DU16  NC  [ESD0402]  5.3 12.3 270 top
FID1  FIDUCAL MARK  [FIDICALMARK]  90.9 57.2 0 top
FID2  FIDUCAL MARK  [FIDICALMARK]  2.2 3.2 0 top
H1  FIDUCAL MARK  [FIDICALMARK]  85.1 15.5 180 bottom
H2  FIDUCAL MARK  [FIDICALMARK]  9.9 70.8 180 bottom
J1  FPC_KEY_0  [FPC6-0_3-2_5X4_5H1_0L]  90.7 27.8 90 top
J11  CON30/DOWN  [050K-DX-30PWB]  3.2 47.6 270 top
J12  CON6  [FPC6-0_3-2_5X4_5H1_0L]  73.6 8.93 0 top
J29  CON51PIN_CTP  [FPC-51D-P03-H15]  0.87 26.5 270 top
JA1  NC/ADJ-312-P32-39X  [ADJ-312-P32-39X]  60.27 8.36 270 top
JA2  SPK  [WF_080_2P]  3.15 62.5 270 top
JA4  SPK  [WF_080_2P]  22.1 69.75 180 top
JA5  SPK  [WF_080_2P]  15.7 69.75 180 top
JA14  1.25_5PIN_B  [FPC5_5-1_25-7_4X11_4H1_85FR_G]  80.25 68.8 180 top
JA15  SPK  [WF_080_2P]  3.15 68.9 270 top
JC1  TF-SLOT  [TF-9P-CSTT-102010909]  23.83 17.92 0 top
JL4  -  [FPC-6S-P05-H10-A]  3.38 32.55 90 top
JL5  FPC-6S-P05-H10-R  [FPC6-0_3-2_5X4_5H1_0L]  90.7 34 90 top
JP1  NC/J_BAT_TS  [BAT_SMD-3]  80.2 70.7 0 top
JU3  TYPE-C  [USB_CF_16PIN_SINK]  9.5 1 180 bottom
JV1  CON39PIN_CAMERA  [FPC0310-39B2-GXX-L]  80.29 17.31 0 top
JW1  ANT-IPX  [ANT_4P]  90.55 67.9 270 top
JW2  ANT-IPX  [ANT_4P]  90.55 61.4 270 top
JZ1  CON5  [CA0103021-R]  14.8 31 270 top
JZ2  CON5  [CA0103021-R]  53.1 72.1 180 top
JZ3  CON5  [CA0103021-R]  72.1 58.4 270 top
JZ4  CON5  [CA0103021-R]  19.8 59.8 0 top
JZ5  CON5  [CA0103021-R]  59 21.6 0 top
JZ6  CON5  [CA0103021-R]  21.3 21.6 180 top
JZ7  CON5  [CA0103021-R]  72.1 33.2 270 top
KP4  POWER  [KEY_3X3]  11.98 26.89 270 top
L2  10uH@1A DCR<0.1R  [SWPA4018S]  26.9 56.8 180 top
LD1  2.2uH-2A  [LP200_250H100]  67.5 65.2 90 top
LL1  10uH@1A DCR<0.1R  [SWPA3015S]  11.8 35.3 180 top
LP1  1.0uH/4A  [WPN303015H]  29.3 34.4 270 top
LP2  1.0uH/3A  [LP200_250H120]  24.9 47.3 90 top
LP3  1.0uH/1.5A  [LP200_250H120]  29.1 47.3 90 top
LP4  1.0uH/3A  [LP200_250H120]  17.7 41.5 0 top
LP6  2.2uH/2A  [LP200_250H100]  83.9 35.3 90 top
LP8  2.2uH/1.5A  [LP200_250H100]  35.9 57.8 180 top
LP17  1.0uH/2A  [LP200_250H120]  34.1 25 0 top
LP18  1.0uH/3A  [LP200_250H120]  34.1 27.8 0 top
LP19  1.0uH/2A  [LP200_250H120]  27.9 30.3 180 top
LU1  NC/CMF1210DH900MFR  [L_CHOKE_SMD_DLP0NS0806]  9.4 9.3 270 top
LU2  NC/CMF1210DH900MFR  [L_CHOKE_SMD_DLP0NS0806]  73.8 13.5 90 top
LW1  NC/2.2uH  [LP200_250H100]  77.6 39.2 0 top
NOREF  -  []  92.97 72.89 180 top
NOREF#2  -  [unnamed#2]  67.46 2.97 0 top
NOREF#3  -  [unnamed#2]  16.82 3.2 0 top
NOREF#4  -  []  -318.23 -108.45 0 top
NOREF#5  -  []  -289.9 -57.49 270 top
NOREF#6  -  [unnamed#2]  1.4 6.4 0 top
NOREF#7  -  []  191.97 72.89 180 top
NOREF#8  -  [unnamed#2]  35.2 2.8 0 top
NOREF#9  -  []  39.27 14.27 0 top
NOREF#10  -  [unnamed#2]  67.46 5.87 0 top
NOREF#11  -  [unnamed#2]  6.2 8.7 0 top
NOREF#12  -  [unnamed#2]  70.96 4.32 0 top
QV1  SI2300  [SOT23]  81.3 24.6 270 top
R2  0R  [R0201]  62.4 45.4 0 bottom
R3  10M  [R0201]  68.1 45.5 270 top
R4  0R  [R0201]  65.6 47 180 top
R5  10K-1%  [R0402]  62.5 31.3 270 top
R6  NC/47K  [R0402]  48.6 23.1 0 top
R7  10K-1%  [R0402]  63.5 31.3 270 top
R8  3.9K-1%  [R0402]  62.5 29.3 270 top
R9  1K  [R0402]  49.6 24.1 180 top
R10  NC-1%  [R0402]  63.5 29.3 270 top
R12  0R  [R0201]  61.1 36.4 225 bottom
R13  200R-1%  [R0201]  45.8 33.3 225 bottom
R14  200R-1%  [R0201]  42.7 34.6 45 top
R15  1K-1%  [R0201]  43.5 32.5 225 top
R16  10K-1%  [R0201]  84.8 25.5 270 top
R17  5.6K-1%  [R0201]  85.1 27.4 0 top
R18  15K-1%  [R0201]  85.1 26.6 0 top
R19  1K  [R0201]  85.1 29 0 top
R20  1K  [R0201]  87.3 25 180 top
R21  NC/10K  [R0201]  36.9 46.8 270 top
R22  NC/10K  [R0201]  37.7 48.2 270 top
R23  NC/10K  [R0201]  38.5 48.2 270 top
R24  NC/10K  [R0201]  36.9 48.2 270 top
R25  47K  [R0201]  54.2 4.7 180 bottom
R26  0R  [R0201]  74.6 27.4 180 top
R27  0R  [R0201]  76.1 22.6 270 top
R28  2K  [R0201]  73.5 29.4 90 top
R29  2K  [R0201]  73.5 27.7 90 top
R30  NC/22R  [R0402]  37.2 8.3 180 top
R31  NC/10K  [R0201]  36.8 7.3 180 top
R33  NC/0R  [R0201]  73.5 31.5 90 top
R34  4.7K  [R0201]  74.6 28.2 180 top
R35  NC/10K  [R0201]  77.1 30.1 90 top
R36  NC/0R  [R0201]  77.1 31.5 90 top
R39  0R  [R0201]  44.5 33.5 45 top
R40  0R  [R0201]  44 34 45 top
R41  2K  [R0201]  19.9 61.4 90 top
R42  2K  [R0201]  19.1 61.4 90 top
R44  1K-1%  [R0402]  37.8 36.3 0 top
R45  0R  [R0402]  62.35 32.95 135 top
R46  0R  [R0402]  62.45 34.45 315 top
R47  NC/47K  [R0402]  57.9 24.4 180 top
R48  1K  [R0402]  57.9 25.4 180 top
R57  NC/0R  [R0201]  59.5 38.4 225 bottom
R454  0R/NC  [R0805]  22.9 57.8 180 top
R455  0R/NC  [R1206]  26.9 56.8 180 top
R524  NC  [R0402]  87.4 36.5 180 top
R525  1K  [R0201]  16 28.4 90 top
R528  NC  [R0402]  37.7 6.3 180 top
RA1  1M  [R0201]  79.7 30.9 0 top
RA2  2K  [R0201]  66.3 32.5 270 bottom
RA3  0R  [R0201]  52.8 10.5 0 top
RA4  0R  [R0201]  66.8 12.7 270 top
RA5  47K  [R0201]  52.5 11.7 270 top
RA6  0R  [R0201]  66 10.1 270 top
RA7  22R  [R0201]  67.4 10.1 270 top
RA8  22R  [R0201]  68.4 12.1 90 top
RA9  NC/100K  [R0201]  66 12.7 270 top
RA10  NC/0R  [R0201]  52.1 6.8 90 top
RA11  1M  [R0201]  7.1 70.1 0 top
RA12  1M  [R0201]  7.1 63.7 0 top
RA13  100K  [R0201]  9.9 65.1 180 top
RA14  0R  [R0201]  7.1 62.9 180 top
RA15  100K  [R0201]  9.9 71.5 180 top
RA16  0R  [R0201]  7.1 69.3 180 top
RA17  100K  [R0201]  11 64.2 90 top
RA18  0R  [R0201]  7.1 62.1 180 top
RA19  100K  [R0201]  11 70.6 90 top
RA20  0R  [R0201]  7.1 68.5 180 top
RA21  1K  [R0201]  64.4 32.5 90 top
RA22  1K  [R0201]  16.5 64.5 0 top
RA23  1.5K  [R0201]  65.2 32.5 90 top
RA24  1.5K  [R0201]  16.5 65.3 0 top
RA25  1.5K  [R0201]  66 32.5 90 top
RA26  1.5K  [R0201]  14.3 65.3 0 top
RA27  1K  [R0201]  66.8 32.5 90 top
RA28  1K  [R0201]  14.3 64.5 0 top
RA29  0R  [R0603]  17.95 61.5 180 top
RA30  0R  [R0402]  24.4 62.3 270 top
RA31  51K  [R0201]  24.4 63.9 0 top
RA32  2K-1%  [R0201]  15.8 68.2 90 bottom
RA33  20K-1%  [R0201]  14.7 67.9 0 bottom
RA34  20K-1%  [R0201]  14.7 67.3 0 bottom
RA35  2K-1%  [R0201]  15.8 67 90 bottom
RA36  2K-1%  [R0201]  16.6 65.6 90 bottom
RA37  20K-1%  [R0201]  14.7 65.3 0 bottom
RA38  20K-1%  [R0201]  14.7 64.7 0 bottom
RA39  2K-1%  [R0201]  16.6 64.4 90 bottom
RA40  0R  [R0201]  84.4 32.9 0 top
RA41  NC/0.01R-1%  [R0603]  12.95 57.5 180 top
RA42  0.01R-1%  [R0603]  12.95 59.1 180 top
RA43  1K  [R0201]  65.7 37.9 180 top
RA44  1K  [R0201]  66.6 34.4 180 bottom
RA45  1K  [R0201]  68 34.4 0 bottom
RA47  0R  [R0402]  52.1 8.1 90 top
RC1  33R  [R0201]  45.5 32.4 225 top
RC2  2R2  [R0402]  37.1 22.8 180 top
RC3  NC/47K  [R0201]  36.3 18.9 0 top
RC4  NC/10K  [R0201]  26.9 20.3 90 top
RC5  1K  [R0201]  36.3 18.1 0 top
RD1  0R  [R0201]  51.4 55.3 0 top
RD2  0R  [R0201]  57.6 55.3 90 top
RD3  240R-1%  [R0201]  47.6 60.9 0 bottom
RD4  240R-1%  [R0201]  48.1 62.8 0 bottom
RD5  120R-1%  [R0201]  49.3 45.8 135 bottom
RD6  NC/0R  [R0201]  54.5 67 270 bottom
RD7  NC/0.01R-1%  [R0402]  66.2 67.7 180 top
RD8  2K-1%  [R0201]  69.4 57.5 0 top
RD9  100K-1%  [R0201]  69.4 59.1 180 top
RD10  0.01R-1%  [R0201]  62 67.3 270 bottom
RD11  0.01R-1%  [R0201]  62.8 67.3 270 bottom
RD12  NC/0.01R-1%  [R0201]  63.7 66.4 180 bottom
RD13  NC/0.01R-1%  [R0201]  63.7 65.7 180 bottom
RH1  1K8-1%  [R0402]  50.9 12.6 90 top
RH2  1K8-1%  [R0402]  49.9 12.6 90 top
RH3  1K  [R0402]  38.2 8.3 0 top
RH4  27K-1%  [R0402]  39.1 10.6 0 top
RH5  100R  [R0402]  47.9 10.6 90 top
RH9  100R  [R0402]  49.9 10.6 90 top
RH10  100R  [R0402]  48.9 10.6 90 top
RL1  10K  [R0201]  10.3 52 0 top
RL2  NC/10K  [R0201]  10.3 53 0 top
RL3  10K  [R0201]  8.3 44.9 0 top
RL4  6.8K-1%  [R0402]  11.2 40.1 0 top
RL5  NC/10K  [R0201]  8.5 52 180 top
RL6  10K  [R0201]  8.5 53 180 top
RL7  NC/10K  [R0201]  8.3 44.1 180 top
RL8  4.3K-1%  [R0402]  13.2 41.6 180 top
RL9  0R/1.5K  [R0402]  10 43.1 270 top
RL10  1M/1.8K  [R0402]  9 43.1 270 top
RL11  NC  [R0402]  11.2 54 180 top
RL12  0R  [R0402]  10 41.1 180 top
RL13  NC/0R  [R0402]  9 40.1 90 top
RL14  0R  [R0402]  10.2 56.2 270 top
RL15  0.01R-1%  [R0603]  31.9 52.45 90 top
RL17  NC/0.01R-1%  [R0603]  30.3 56.95 270 top
RL19  442K-1%  [R0402]  8.9 30.3 180 top
RL20  NC/0R  [R0402]  20.5 50.2 90 top
RL21  0R  [R0402]  22.7 52.2 0 top
RL22  2K  [R0402]  11.2 49.8 90 top
RL23  63.4K-1%  [R0402]  7.9 31.4 0 top
RL24  47K  [R0402]  13.4 55.2 180 top
RL25  0R  [R0402]  21.5 53.2 270 top
RL26  100K  [R0402]  21.5 50.2 90 top
RL27  3.6R-1%  [R0603]  8.2 49.05 270 top
RL28  NC/4.7K-1%  [R0402]  20.5 53.2 270 top
RL29  1K  [R0402]  19.3 55.2 90 top
RL30  NC/4.7K-1%  [R0402]  21.5 54.2 180 top
RL31  NC/33K-1%  [R0402]  23.7 53.2 180 top
RL32  47K  [R0402]  18.3 58.2 270 top
RL33  2K  [R0201]  48.2 20 0 top
RL34  2K  [R0201]  48.2 18.7 0 top
RL35  0R  [R0402]  5.7 27.8 0 top
RL36  0R/NC  [R0402]  7.39 12.33 180 top
RL37  0R  [R0402]  16.6 10.7 90 top
RL38  NC  [R0402]  11.2 55.2 180 top
RL39  3.6R-1%  [R0603]  8.05 50.6 0 top
RM1  33R  [R0201]  45.4 48.1 135 top
RM6  0R  [R0201]  33.2 67.5 180 bottom
RM7  0R  [R0201]  38 58.4 90 top
RM8  NC/10K  [R0201]  31.8 67.5 180 bottom
RM9  NC/10K  [R0201]  30.9 66.7 180 bottom
RM10  NC/10K  [R0201]  32.6 66 180 bottom
RN1  NC/0R  [R0201]  53.1 9.4 270 top
RN2  NC/0R  [R0402]  53.1 8.1 0 top
RP2  10K  [R0201]  41.1 68.8 0 top
RP3  NC/10K  [R0402]  81.2 63.9 180 top
RP4  NC/10K  [R0201]  66.3 45.4 270 bottom
RP5  NC/2K  [R0201]  70.2 41.7 270 bottom
RP6  NC/2K  [R0201]  69.4 41.7 270 bottom
RP8  0R  [R0402]  18.6 29 90 top
RP10  NC  [R0603]  16.5 39.45 270 top
RP14  10K  [R0402]  36.55 15.58 270 top
RP15  470R  [R0201]  24.6 34 270 top
RP16  0.01R-1%  [R0402]  33.74 34.74 180 top
RP17  470R  [R0201]  23.8 34 270 top
RP28  0.01R-1%  [R0402]  33.3 45.1 0 top
RP31  0R  [R0402]  33.4 53.1 90 top
RP32  NC/0R  [R0402]  31.9 57.5 90 top
RP33  0R  [R0402]  43.7 30.1 270 top
RP34  NC/0R  [R0402]  42.7 30.1 270 top
RP35  0R  [R0402]  33.2 40.1 0 top
RP41  NC/0R  [R0402]  43.7 27.1 90 top
RP43  100K  [R0201]  78.6 33.9 0 top
RP44  20K-1%  [R0402]  77.9 36.7 0 top
RP45  91K-1%  [R0402]  78.9 35.7 180 top
RP46  0R  [R0402]  33.4 58.5 180 top
RP51  20K-1%  [R0402]  37.7 51.9 0 top
RP52  91K-1%  [R0402]  38.7 50.9 180 top
RP53  NC/0R  [R0402]  33.2 35.9 0 top
RP56  0R  [R0402]  41.7 30.1 270 top
RP57  0R  [R0201]  33.5 38 0 top
RP58  NC/0R  [R0402]  33.4 56.3 270 top
RP59  NC/0R  [R0201]  59 39.3 225 bottom
RP65  0R/NC  [R0603]  11.4 11.05 90 top
RP68  6K8-1%  [R0201]  25 22.97 0 top
RP73  0R/NC  [R0603]  9.8 11.05 90 top
RP74  100K  [R0201]  23 28.9 0 top
RP75  NC  [R0402]  15.6 9.6 270 top
RP76  0R  [R0402]  16.6 8.6 90 top
RP77  10K  [R0402]  17 20.2 0 top
RP83  0R  [R0402]  20 20.2 180 top
RP84  0R  [R0201]  24.5 25.9 270 top
RP86  0R  [R0201]  61.9 26.4 180 top
RP118  0R-1%  [R0603]  35.4 29.85 90 top
RP119  0R-1%  [R0603]  24.93 28.75 270 top
RP128  0R  [R0201]  26.3 24.1 180 top
RP129  10K/NC  [R0201]  26.3 24.9 0 top
RP130  0R  [R0201]  24.8 24.9 0 top
RU1  0R  [R0201]  9.1 9.3 90 top
RU2  0R  [R0201]  9.7 9.3 90 top
RU3  NC/0R  [R0603]  62.95 23.2 180 top
RU4  20K  [R0201]  75.5 15.8 90 top
RU5  0R  [R0201]  73.5 13.5 90 top
RU6  0R  [R0201]  74.1 13.5 90 top
RU7  0R  [R0201]  73.9 15.8 90 top
RU8  NC  [R0201]  74.7 15.8 270 top
RU9  100K  [R0201]  60.5 26.4 180 top
RU10  6K8-1%  [R0201]  63.3 26.4 0 top
RU20  0R  [R0402]  3.5 9.25 180 top
RU21  0R  [R0402]  7.4 11.3 180 top
RU28  NC/0R  [R0603]  49.65 15.2 180 top
RU29  NC/0R  [R0805]  67.9 25.4 180 top
RV1  33R  [R0201]  56.7 32.6 135 bottom
RV2  100K  [R0201]  83.1 22.2 180 top
RV3  100K  [R0201]  81.7 22.2 0 top
RV4  100K  [R0201]  84.5 22.2 0 top
RV5  100K  [R0201]  83.7 23 0 top
RV6  2K  [R0201]  83.7 23.8 0 top
RV7  2K  [R0201]  83.7 24.6 0 top
RV12  4.7R  [R0402]  87.3 24.1 270 top
RV13  NC/10K  [R0201]  80.6 27.2 0 top
RV14  10K  [R0201]  81.7 27.5 270 top
RW1  33R  [R0201]  59.7 31.4 315 top
RW2  NC/10K  [R0201]  81.1 39.2 180 top
RW3  33K  [R0201]  75 45.7 180 top
RW4  33K  [R0201]  75 46.5 180 top
RW5  33K  [R0201]  75 49.7 180 top
RW6  33K  [R0201]  75 50.5 180 top
RW7  33K  [R0201]  75 48.1 180 top
RW8  33K  [R0201]  75 47.3 180 top
RW9  NC/10K  [R0201]  75 51.9 180 top
RW10  0R  [R0201]  81.7 60.6 225 top
RW11  0R  [R0201]  86.7 58.1 270 top
RW12  0R  [R0201]  75 53.7 180 top
RW15  0R  [R0201]  91.2 51.2 180 top
RW16  NC/0R  [R0201]  91.2 52 180 top
RW17  NC/0R  [R0201]  75 54.5 180 top
RW18  10K  [R0201]  91.2 46.2 0 top
RW19  10K  [R0201]  91.2 45.4 0 top
RW20  NC/10K  [R0201]  91.2 47.8 0 top
RW21  NC/10K  [R0201]  91.2 48.6 0 top
RW22  NC/0R  [R0201]  75 52.9 180 top
RW23  NC/10K  [R0201]  75 43.9 0 top
RW24  NC/10K  [R0201]  91.2 47 180 top
RW25  NC/10K  [R0201]  91.2 49.4 180 top
RW30  NC/0R  [R0201]  82.4 39.5 270 top
RW63  0R  [R0201]  91.2 52.8 180 top
RW64  NC/10K  [R0201]  91.2 54.6 0 top
RW65  NC/10K  [R0201]  91.2 43.9 0 top
T7  TEST  [TP30]  50.75 40.53 180 bottom
T8  TEST  [TP30]  54.38 42.58 180 bottom
T9  TEST  [TP30]  52.1 38.7 180 bottom
T10  TEST  [TP30]  62.1 37.3 180 bottom
TP1  VBAT  [TP100]  77.7 62.3 0 top
TP2  TS  [TP100]  80.2 62.3 0 top
TP3  GND  [TP100]  77.7 59.8 0 top
TP5  JTAG-SEL  [TP100]  53.9 26.7 90 bottom
TP6  PLLTEST  [TP100]  63.4 47.4 90 bottom
TP7  VCC-CTP  [TP100]  5.5 35.1 180 bottom
TP8  TP-INT  [TP100]  5.5 33.6 180 bottom
TP9  TP-SCK  [TP100]  5.5 32.1 180 bottom
TP10  TP-SDA  [TP100]  5.5 30.6 180 bottom
TP11  TP-RST  [TP100]  5.5 29.1 180 bottom
TP12  SPKR-  [TP100]  3.4 67.9 0 bottom
TP13  SPKL-  [TP100]  3.4 61.5 0 bottom
TP14  SPKR+  [TP100]  3.4 69.9 0 bottom
TP15  SPKL+  [TP100]  3.4 63.5 0 bottom
TP16  GND  [TP100]  89.6 27.1 180 bottom
TP17  POWKEY  [TP100]  89.6 25.1 180 bottom
TP18  VOL-  [TP100]  91.6 27.1 180 bottom
TP19  VOL+  [TP100]  91.6 29.1 180 bottom
TP20  RESET-KEY  [TP100]  89.6 29.1 180 bottom
TP21  VCC-3V3  [TP100]  37.5 49.5 180 bottom
TP22  CPUX-TX  [TP100]  41.1 47.7 90 bottom
TP23  CPUX-TDI  [TP100]  37.5 45.9 180 bottom
TP24  CPUX-TMS  [TP100]  39.3 47.7 180 bottom
TP25  CPUX-RX  [TP100]  41.1 45.9 90 bottom
TP26  CPUX-TCK  [TP100]  39.3 45.9 180 bottom
TP27  CPUX-TDO  [TP100]  37.5 47.7 180 bottom
TP28  GND  [TP100]  41.1 49.5 180 bottom
TP29  GND  [TP100]  39.3 49.5 180 bottom
TP30  CPUS-TX  [TP100]  73.4 41.3 90 top
TP31  CPUS-RX  [TP100]  73.4 37.7 90 top
TP32  CPUS-TMS  [TP100]  73.4 39.5 90 top
TP33  CPUS-TCK  [TP100]  75.2 35.9 90 top
TP34  CPUS-TDO  [TP100]  73.4 44.9 90 top
TP35  CPUS-TDI  [TP100]  73.4 43.1 90 top
TP36  DSP-TMS  [TP100]  73.4 48.5 90 top
TP37  DSP-TCK  [TP100]  73.4 46.7 90 top
TP38  DSP-TDO  [TP100]  75.2 39.5 90 top
TP39  DSP-TDI  [TP100]  75.2 37.7 90 top
TP40  UBOOT  [TP100]  17.1 28.9 270 top
TP41  HP-DET-1  [TP100]  89.6 34.3 180 bottom
TP42  HPOUTR-1  [TP100]  91.6 34.3 180 bottom
TP43  HPOUTL-1  [TP100]  89.6 32.3 180 bottom
TP44  HPOUTFB-1  [TP100]  91.6 32.3 180 bottom
TP45  HS-MIC-1  [TP100]  89.6 36.3 180 bottom
TP46  REFCLK-OUT  [TP100]  64.1 49.3 90 bottom
TP49  PCIE-TEST  [TP100]  45 32 90 bottom
U1  A527  [BGA664P50B1700_1700H180]  53.5 39.5 135 top
U2  NC/QMI8658A/ICM-42670-P  [LGA14P50B250_300H81]  74.8 25.3 180 top
U3  TCS9243/NC  [SOT-23]  53.46 7.38 270 bottom
U5  MMC5603NJ/NC  [BGA4P40B82_82H57]  74.3 33.6 90 top
U6  NC/STK3310  [ALS8P97B236_394H140]  39.55 8.55 0 bottom
U7  DA215S/MC3433  [LGA12P50B200_200H100]  75.3 30 90 top
UA1  AW8737FCR  [FCQFN16P40B200_200H75]  9.2 62.7 180 top
UA2  AW8737FCR  [FCQFN16P40B200_200H75]  9.2 69.1 180 top
UA3  AC107  [QFN20P40B300_300H75]  21.5 64.3 180 top
UD1  LPDDR4_FBGA200  [BGA200P65_80B1000_1500H90]  54.75 61.55 90 top
UD2  SY8089A1AAC  [SOT5P95B160_300H130]  68 61.6 270 top
UL1  LP3380/RY3750  [SOT23-6]  10.4 32.75 270 top
UL3  GSL3676/BL3676  [QFN57P40B700_700H75]  10.18 18.24 0 top
UL4  LP3307B6F  [SOT23-6]  25.5 53.85 270 top
UM1  eMMC_153BALL  [BGA153P50B1150_1300H109]  33.5 65.3 270 top
UP1  AXP717C  [QFN53P40B600_600H75]  26.6 41 90 top
UP2  BCT72901/AW3291X  [FCQFN12P40B130_180H55]  13.6 10.6 0 top
UP3  SY6280/WS4603E  [SOT23-5]  21.45 24.9 0 top
UP5  SY8089A1AAC  [SOT5P95B160_300H130]  81.1 35.1 90 top
UP7  SY8089A1AAC  [SOT5P95B160_300H130]  37.5 54.7 270 top
UP8  AXP323  [QFN20P40B300_300H75]  29.5 26 270 top
UU1  SY6280/WS4603E  [SOT23-5]  63.6 23.35 90 top
UW1  RTL8852BS/AP6398S  [QFN50P90B1300_1500H150]  83.1 48.8 180 top
Y1  24M-16pF-10ppm  [DSX321G]  67.5 50.05 180 top
Y2  32.768K-12.5pF-20ppm  [MS2V]  70.75 44.73 90 top
YW1  NC/37.4M-18pF-10ppm  [X4B250_320H120_SMD]  74.4 57.7 180 top

## Library data of the parts
BL1 = FB-0402: User Part Number: *; Tolerance: *
C1 C2 C4-C6 C8-C10 C13-C24 C26-C31 C33-C35 C37 C39-C42 C44-C48 C50-C52 C54-C68 C70-C73 C78-C85 C90-C92 C94 C96 C97 C100-C103 C133 CA2-CA9 CA13 CA14 CA17 CA21-CA37 CA39 CA41-CA68 CD2-CD11 CD13-CD18 CD20-CD27 CD29-CD33 CL2 CL4 CL21 CL22 CL29 CM1-CM4 CM6 CM8 CP51 CP54 CP67 CP149 CU4 CV1 CV3 CV4 CV6 CV7 CW1-CW6 CW8 CW14 CW15 CW17 CW19 = C-C0402
C3 C7 C11 C12 C25 C32 C36 C38 C43 C49 C69 C93 C95 C98 C104-C115 CA1 CA10-CA12 CA15 CA16 CA18-CA20 CC1 CD1 CD12 CD19 CD28 CD34-CD36 CH1-CH4 CL3 CL6-CL14 CL16-CL20 CL25 CL27 CL28 CL30 CL31 CP49 CP50 CP53 CP56 CP65 CP66 CV2 CV5 CV8 CV9 CW16 CW18 CW20 CW21 = C-C0402: User Part Number: *; Tolerance: *
C651 = CAPACITOR_0: User Part Number: *; Tolerance: *
CA38 CA40 CL5 CL15 CP3-CP6 CP8-CP10 CP12 CP13 CP15-CP19 CP22 CP62 CP68 CP135-CP141 CP143-CP148 CU3 CU6 = C-C0603: User Part Number: *; Tolerance: *
CON2 = HDMI19_PLUG_2
CP1 CP2 CP7 CP11 CP20 CP23-CP28 CP31-CP42 CP59 CP61 CP69 CU5 CU11 = C-C0603
D2-D6 D83 DA1-DA18 DC1-DC8 DL7-DL11 DU2 DU3 DU5 DU6 DU9-DU16 = ESD9B5VL: User Part Number: *; Tolerance: *
D13 D79-D82 DH8 DL2 DP10 DP11 = D_1
DH1 DH2 = ESD-ULC0524P
DH3-DH7 = ESD9B5VL_0: User Part Number: *; Tolerance: *
DL3 DL5 = DIODE_DUAL_3
DL4 DL6 = DIODE SCHOTTKY
DP1 DP6 DU8 = DIODE SCHOTTKY_1
DP2 = DIO-1N4148
DP4 = DIO-1N5819HW
DP5 = LED-0805-G: Tolerance: *; User Part Number: *
FID1 FID2 H1 H2 = T POINT R_2: Tolerance: *; User Part Number: *
J1 JL5 = FPC_KEY_0: User Part Number: #REF
J11 = CLAP070LF02CW_4: Tolerance: *; User Part Number: *
J12 = CLAP070LF02CW_5: User Part Number: #REF
J29 = CON51PIN_CTP
JA1 = PJ381-2_0
JA2 JA4 JA5 JA15 = CONN RCPT 1_1
JA14 = CON30_11
JC1 = TF-SLOT
JL4 = FPC_KEY_0
JP1 = J_BAT_TS
JU3 = USB_MINI_SOCKET_3
JV1 = CON39PIN_CAMERA
JW1 JW2 = SMA/RF_0: room: wifi
JZ1-JZ7 = CON5
KP4 = MTP1112E_0
L2 LL1 = INDUCTOR
LD1 LP6 LP8 = L-L2520
LP1 = L_4012
LP2-LP4 LP17-LP19 = L_LP200_250H120
LU1 LU2 = ICMS212B900MFR_0
LW1 = INDUCTORS OF FERRITE
QV1 = MOSFET N
R2 R4 R19-R29 R31 R33-R36 R39-R42 R57 R525 RA1-RA28 RA31 RA40 RA43-RA45 RC1 RC3-RC5 RD1 RD2 RL1-RL3 RL5-RL7 RL33 RL34 RM6-RM10 RN1 RP2 RP4-RP6 RP15 RP17 RP43 RP57 RP59 RP74 RP84 RP86 RP129 RU1 RU2 RU4-RU9 RV1-RV7 RV13 RV14 RW1-RW12 RW15-RW25 RW30 RW63-RW65 = R-R0402-5%
R3 R12-R15 RD3-RD6 RD8-RD13 RP68 RU10 = R-R0402-1%
R5 R7 R8 R10 RL4 RL8 RL19 RL23 RL28 RL30 RL31 RP8 RP16 RP28 RP44 RP45 RP51 RP52 = R-R0603-1%: User Part Number: *; Tolerance: *
R6 R9 R30 R45 R47 R48 R524 R528 RA30 RA47 RC2 RH1-RH5 RH9 RH10 RL9-RL14 RL20-RL22 RL24-RL26 RL29 RL32 RL35-RL38 RN2 RP3 RP14 RP31-RP35 RP41 RP46 RP53 RP56 RP58 RP75-RP77 RP83 RU20 RU21 RU29 RV12 = R-R0402-5%: User Part Number: *; Tolerance: *
R16-R18 RA32-RA39 RP128 RP130 = R-R0603-1%
R44 R46 RD7 = R-R0402-1%: User Part Number: *; Tolerance: *
R454 = R: User Part Number: *; Tolerance: *
R455 = R
RA29 RU3 RU28 = R-R0402-5%: Tolerance: *; User Part Number: *
RA41 RA42 RL15 RL17 RL27 RL39 RP65 RP73 RP118 RP119 = R-R0603-1%: Tolerance: *; User Part Number: *
RM1 = R-R0402-1%: signal model: R-R0402-5%_R0402_33R_33R
RP10 = R-R0603-5%: Tolerance: *; User Part Number: *
T7-T10 = TestPoint-on wire
TP1-TP3 TP5-TP46 TP49 = TestPoint-SMD: Tolerance: *; User Part Number: *
U1 = A527/MR527/T527-V1
U2 = ICM-42670-P
U3 = MH248ESQ
U5 = AK09918C
U6 = STK3310
U7 = MC3433
UA1 UA2 = AW8737FCR
UA3 = AC107s_standard_0
UD1 = LPDDR4_FBGA200
UD2 = SY8089A_0
UL1 = AP3019_0: Tolerance: *; User Part Number: *
UL3 = GSL3676
UL4 = AP3031_0: Tolerance: *; User Part Number: *
UM1 = eMMC_153BALL
UP1 = AXP717C
UP2 = BCT72901
UP3 UU1 = SY6280: Tolerance: *; User Part Number: *
UP5 UP7 = SY8089A
UP8 = AXP323
UW1 = RTL8852BS
Y1 = CRY-24MHz-3225-SMD: User Part Number: *; Tolerance: *
Y2 = CRY-32_1.768KHz-2X6-DIP: Tolerance: *; User Part Number: *
YW1 = CRY-37.4MHz-3225-SMD

## Footprints (pads in the part's own frame, mm; a bottom-side part is the same pattern mirrored in y, then rotated)
050K-DX-30PWB
  rect 0.3x1.25 smd: 1(-7.25,2.5) 2(-6.75,2.5) 3(-6.25,2.5) 4(-5.75,2.5) 5(-5.25,2.5) 6(-4.75,2.5) 7(-4.25,2.5) 8(-3.75,2.5) 9(-3.25,2.5) 10(-2.75,2.5) 11(-2.25,2.5) 12(-1.75,2.5) 13(-1.25,2.5) 14(-0.75,2.5) 15(-0.25,2.5) 16(0.25,2.5) 17(0.75,2.5) 18(1.25,2.5) 19(1.75,2.5) 20(2.25,2.5) 21(2.75,2.5) 22(3.25,2.5) 23(3.75,2.5) 24(4.25,2.5) 25(4.75,2.5) 26(5.25,2.5) 27(5.75,2.5) 28(6.25,2.5) 29(6.75,2.5) 30(7.25,2.5)
  rect 2.5x3.5 smd: 31(-9.189,-0.074) 32(9.191,-0.074)
ADJ-312-P32-39X
  oval 2x1.1 hole 1.4x0.6: 1(4.75,-4.05) 2(1.95,-4.05) 3(4.17,4.05) 4(-2.3,4.05) 5(-2.3,-4.05)
ALS8P97B236_394H140
  rect 0.72x0.7 smd: 1(-1.455,0.7) 2(-0.485,0.7) 3(0.485,0.7) 4(1.455,0.7) 5(1.455,-0.7) 6(0.485,-0.7) 7(-0.485,-0.7) 8(-1.455,-0.7)
ANT_4P
  rect 1x1 smd: 1(0,-1.5) 4(0,1.5)
  custom 1.1x2.2 smd: 2(1.5,0) 3(-1.5,0)
BAT_SMD-3
  rect 1.78x2.29 smd: 1(-3.27,0) 2(0,0) 3(3.27,0)
BGA4P40B82_82H57
  round 0.25 smd: A1(-0.2,0.2) A2(0.2,0.2) B1(-0.2,-0.2) B2(0.2,-0.2)
BGA153P50B1150_1300H109
  oval 0.195x0.321 smd: A1(-3.25,3.25) A2(-2.75,3.25) A3(-2.25,3.25) A4(-1.75,3.25) A5(-1.25,3.25) A6(-0.75,3.25) A7(-0.25,3.25) A8(0.25,3.25) A9(0.75,3.25) A10(1.25,3.25) A11(1.75,3.25) A12(2.25,3.25) A13(2.75,3.25) P2(-2.75,-3.25) P3(-2.25,-3.25) P4(-1.75,-3.25) P5(-1.25,-3.25) P6(-0.75,-3.25) P7(-0.25,-3.25) P8(0.25,-3.25) P9(0.75,-3.25) P10(1.25,-3.25) P11(1.75,-3.25) P12(2.25,-3.25) P13(2.75,-3.25) P14(3.25,-3.25)
  oval 0.321x0.195 smd: A14(3.25,3.25) B1(-3.25,2.75) B14(3.25,2.75) C1(-3.25,2.25) C14(3.25,2.25) D1(-3.25,1.75) D14(3.25,1.75) E1(-3.25,1.25) E14(3.25,1.25) F1(-3.25,0.75) F14(3.25,0.75) G1(-3.25,0.25) G14(3.25,0.25) H1(-3.25,-0.25) H14(3.25,-0.25) J1(-3.25,-0.75) J14(3.25,-0.75) K1(-3.25,-1.25) K14(3.25,-1.25) L1(-3.25,-1.75) L14(3.25,-1.75) M1(-3.25,-2.25) M14(3.25,-2.25) N1(-3.25,-2.75) N14(3.25,-2.75) P1(-3.25,-3.25)
  round 0.25 smd: B2(-2.75,2.75) B3(-2.25,2.75) B4(-1.75,2.75) B5(-1.25,2.75) B6(-0.75,2.75) B7(-0.25,2.75) B8(0.25,2.75) B9(0.75,2.75) B10(1.25,2.75) B11(1.75,2.75) B12(2.25,2.75) B13(2.75,2.75) C2(-2.75,2.25) C3(-2.25,2.25) C4(-1.75,2.25) C5(-1.25,2.25) C6(-0.75,2.25) C7(-0.25,2.25) C8(0.25,2.25) C9(0.75,2.25) C10(1.25,2.25) C11(1.75,2.25) C12(2.25,2.25) C13(2.75,2.25) D2(-2.75,1.75) D3(-2.25,1.75) D4(-1.75,1.75) D12(2.25,1.75) D13(2.75,1.75) E2(-2.75,1.25) E3(-2.25,1.25) E5(-1.25,1.25) E6(-0.75,1.25) E7(-0.25,1.25) E8(0.25,1.25) E9(0.75,1.25) E10(1.25,1.25) E12(2.25,1.25) E13(2.75,1.25) F2(-2.75,0.75) F3(-2.25,0.75) F5(-1.25,0.75) F10(1.25,0.75) F12(2.25,0.75) F13(2.75,0.75) G2(-2.75,0.25) G3(-2.25,0.25) G5(-1.25,0.25) G10(1.25,0.25) G12(2.25,0.25) G13(2.75,0.25) H2(-2.75,-0.25) H3(-2.25,-0.25) H5(-1.25,-0.25) H10(1.25,-0.25) H12(2.25,-0.25) H13(2.75,-0.25) J2(-2.75,-0.75) J3(-2.25,-0.75) J5(-1.25,-0.75) J10(1.25,-0.75) J12(2.25,-0.75) J13(2.75,-0.75) K2(-2.75,-1.25) K3(-2.25,-1.25) K5(-1.25,-1.25) K6(-0.75,-1.25) K7(-0.25,-1.25) K8(0.25,-1.25) K9(0.75,-1.25) K10(1.25,-1.25) K12(2.25,-1.25) K13(2.75,-1.25) L2(-2.75,-1.75) L3(-2.25,-1.75) L12(2.25,-1.75) L13(2.75,-1.75) M2(-2.75,-2.25) M3(-2.25,-2.25) M4(-1.75,-2.25) M5(-1.25,-2.25) M6(-0.75,-2.25) M7(-0.25,-2.25) M8(0.25,-2.25) M9(0.75,-2.25) M10(1.25,-2.25) M11(1.75,-2.25) M12(2.25,-2.25) M13(2.75,-2.25) N2(-2.75,-2.75) N3(-2.25,-2.75) N4(-1.75,-2.75) N5(-1.25,-2.75) N6(-0.75,-2.75) N7(-0.25,-2.75) N8(0.25,-2.75) N9(0.75,-2.75) N10(1.25,-2.75) N11(1.75,-2.75) N12(2.25,-2.75) N13(2.75,-2.75)
BGA200P65_80B1000_1500H90
  round 0.25 smd: A1(-4.4,6.825) A2(-3.6,6.825) A3(-2.8,6.825) A4(-2,6.825) A5(-1.2,6.825) A8(1.2,6.825) A9(2,6.825) A10(2.8,6.825) A11(3.6,6.825) A12(4.4,6.825) AA1(-4.4,-6.175) AA2(-3.6,-6.175) AA3(-2.8,-6.175) AA4(-2,-6.175) AA5(-1.2,-6.175) AA8(1.2,-6.175) AA9(2,-6.175) AA10(2.8,-6.175) AA11(3.6,-6.175) AA12(4.4,-6.175) AB1(-4.4,-6.825) AB2(-3.6,-6.825) AB3(-2.8,-6.825) AB4(-2,-6.825) AB5(-1.2,-6.825) AB8(1.2,-6.825) AB9(2,-6.825) AB10(2.8,-6.825) AB11(3.6,-6.825) AB12(4.4,-6.825) B1(-4.4,6.175) B2(-3.6,6.175) B3(-2.8,6.175) B4(-2,6.175) B5(-1.2,6.175) B8(1.2,6.175) B9(2,6.175) B10(2.8,6.175) B11(3.6,6.175) B12(4.4,6.175) C1(-4.4,5.525) C2(-3.6,5.525) C3(-2.8,5.525) C4(-2,5.525) C5(-1.2,5.525) C8(1.2,5.525) C9(2,5.525) C10(2.8,5.525) C11(3.6,5.525) C12(4.4,5.525) D1(-4.4,4.875) D2(-3.6,4.875) D3(-2.8,4.875) D4(-2,4.875) D5(-1.2,4.875) D8(1.2,4.875) D9(2,4.875) D10(2.8,4.875) D11(3.6,4.875) D12(4.4,4.875) E1(-4.4,4.225) E2(-3.6,4.225) E3(-2.8,4.225) E4(-2,4.225) E5(-1.2,4.225) E8(1.2,4.225) E9(2,4.225) E10(2.8,4.225) E11(3.6,4.225) E12(4.4,4.225) F1(-4.4,3.575) F2(-3.6,3.575) F3(-2.8,3.575) F4(-2,3.575) F5(-1.2,3.575) F8(1.2,3.575) F9(2,3.575) F10(2.8,3.575) F11(3.6,3.575) F12(4.4,3.575) G1(-4.4,2.925) G2(-3.6,2.925) G3(-2.8,2.925) G4(-2,2.925) G5(-1.2,2.925) G8(1.2,2.925) G9(2,2.925) G10(2.8,2.925) G11(3.6,2.925) G12(4.4,2.925) H1(-4.4,2.275) H2(-3.6,2.275) H3(-2.8,2.275) H4(-2,2.275) H5(-1.2,2.275) H8(1.2,2.275) H9(2,2.275) H10(2.8,2.275) H11(3.6,2.275) H12(4.4,2.275) J1(-4.4,1.625) J2(-3.6,1.625) J3(-2.8,1.625) J4(-2,1.625) J5(-1.2,1.625) J8(1.2,1.625) J9(2,1.625) J10(2.8,1.625) J11(3.6,1.625) J12(4.4,1.625) K1(-4.4,0.975) K2(-3.6,0.975) K3(-2.8,0.975) K4(-2,0.975) K5(-1.2,0.975) K8(1.2,0.975) K9(2,0.975) K10(2.8,0.975) K11(3.6,0.975) K12(4.4,0.975) N1(-4.4,-0.975) N2(-3.6,-0.975) N3(-2.8,-0.975) N4(-2,-0.975) N5(-1.2,-0.975) N8(1.2,-0.975) N9(2,-0.975) N10(2.8,-0.975) N11(3.6,-0.975) N12(4.4,-0.975) P1(-4.4,-1.625) P2(-3.6,-1.625) P3(-2.8,-1.625) P4(-2,-1.625) P5(-1.2,-1.625) P8(1.2,-1.625) P9(2,-1.625) P10(2.8,-1.625) P11(3.6,-1.625) P12(4.4,-1.625) R1(-4.4,-2.275) R2(-3.6,-2.275) R3(-2.8,-2.275) R4(-2,-2.275) R5(-1.2,-2.275) R8(1.2,-2.275) R9(2,-2.275) R10(2.8,-2.275) R11(3.6,-2.275) R12(4.4,-2.275) T1(-4.4,-2.925) T2(-3.6,-2.925) T3(-2.8,-2.925) T4(-2,-2.925) T5(-1.2,-2.925) T8(1.2,-2.925) T9(2,-2.925) T10(2.8,-2.925) T11(3.6,-2.925) T12(4.4,-2.925) U1(-4.4,-3.575) U2(-3.6,-3.575) U3(-2.8,-3.575) U4(-2,-3.575) U5(-1.2,-3.575) U8(1.2,-3.575) U9(2,-3.575) U10(2.8,-3.575) U11(3.6,-3.575) U12(4.4,-3.575) V1(-4.4,-4.225) V2(-3.6,-4.225) V3(-2.8,-4.225) V4(-2,-4.225) V5(-1.2,-4.225) V8(1.2,-4.225) V9(2,-4.225) V10(2.8,-4.225) V11(3.6,-4.225) V12(4.4,-4.225) W1(-4.4,-4.875) W2(-3.6,-4.875) W3(-2.8,-4.875) W4(-2,-4.875) W5(-1.2,-4.875) W8(1.2,-4.875) W9(2,-4.875) W10(2.8,-4.875) W11(3.6,-4.875) W12(4.4,-4.875) Y1(-4.4,-5.525) Y2(-3.6,-5.525) Y3(-2.8,-5.525) Y4(-2,-5.525) Y5(-1.2,-5.525) Y8(1.2,-5.525) Y9(2,-5.525) Y10(2.8,-5.525) Y11(3.6,-5.525) Y12(4.4,-5.525)
BGA664P50B1700_1700H180
  round 0.27 smd: A1(-8,8) A2(-7.5,8) A3(-7,8) A4(-6.5,8) A5(-6,8) A6(-5.5,8) A8(-4.5,8) A10(-3.5,8) A12(-2.5,8) A14(-1.5,8) A16(-0.5,8) A18(0.5,8) A20(1.5,8) A22(2.5,8) A24(3.5,8) A26(4.5,8) A28(5.5,8) A29(6,8) A30(6.5,8) A31(7,8) A32(7.5,8) A33(8,8) AA1(-8,-2) AA2(-7.5,-2) AA3(-7,-2) AA4(-6.5,-2) AA5(-6,-2) AA6(-5.5,-2) AA7(-5,-2) AA9(-4,-2) AA12(-2.5,-2) AA13(-2,-2) AA15(-1,-2) AA16(-0.5,-2) AA18(0.5,-2) AA19(1,-2) AA21(2,-2) AA22(2.5,-2) AA24(3.5,-2) AA26(4.5,-2) AA27(5,-2) AA28(5.5,-2) AA29(6,-2) AA30(6.5,-2) AA31(7,-2) AA32(7.5,-2) AA33(8,-2) AB2(-7.5,-2.5) AB3(-7,-2.5) AB9(-4,-2.5) AB10(-3.5,-2.5) AB11(-3,-2.5) AB12(-2.5,-2.5) AB13(-2,-2.5) AB14(-1.5,-2.5) AB15(-1,-2.5) AB17(0,-2.5) AB24(3.5,-2.5) AB32(7.5,-2.5) AB33(8,-2.5) AC1(-8,-3) AC2(-7.5,-3) AC3(-7,-3) AC4(-6.5,-3) AC5(-6,-3) AC6(-5.5,-3) AC7(-5,-3) AC9(-4,-3) AC15(-1,-3) AC17(0,-3) AC18(0.5,-3) AC19(1,-3) AC20(1.5,-3) AC22(2.5,-3) AC24(3.5,-3) AC26(4.5,-3) AC27(5,-3) AC28(5.5,-3) AC29(6,-3) AC30(6.5,-3) AC31(7,-3) AC32(7.5,-3) AC33(8,-3) AD1(-8,-3.5) AD2(-7.5,-3.5) AD9(-4,-3.5) AD11(-3,-3.5) AD13(-2,-3.5) AD14(-1.5,-3.5) AD15(-1,-3.5) AD20(1.5,-3.5) AD21(2,-3.5) AD22(2.5,-3.5) AD25(4,-3.5) AD32(7.5,-3.5) AD33(8,-3.5) AE1(-8,-4) AE2(-7.5,-4) AE3(-7,-4) AE4(-6.5,-4) AE5(-6,-4) AE6(-5.5,-4) AE7(-5,-4) AE9(-4,-4) AE11(-3,-4) AE12(-2.5,-4) AE13(-2,-4) AE14(-1.5,-4) AE16(-0.5,-4) AE18(0.5,-4) AE19(1,-4) AE20(1.5,-4) AE21(2,-4) AE22(2.5,-4) AE23(3,-4) AE24(3.5,-4) AE25(4,-4) AE26(4.5,-4) AE27(5,-4) AE28(5.5,-4) AE29(6,-4) AE30(6.5,-4) AE31(7,-4) AE32(7.5,-4) AE33(8,-4) AF1(-8,-4.5) AF2(-7.5,-4.5) AF32(7.5,-4.5) AF33(8,-4.5) AG1(-8,-5) AG2(-7.5,-5) AG3(-7,-5) AG4(-6.5,-5) AG5(-6,-5) AG6(-5.5,-5) AG7(-5,-5) AG9(-4,-5) AG11(-3,-5) AG13(-2,-5) AG15(-1,-5) AG17(0,-5) AG19(1,-5) AG21(2,-5) AG23(3,-5) AG25(4,-5) AG28(5.5,-5) AG29(6,-5) AG30(6.5,-5) AG31(7,-5) AG32(7.5,-5) AG33(8,-5) AH1(-8,-5.5) AH2(-7.5,-5.5) AH7(-5,-5.5) AH9(-4,-5.5) AH11(-3,-5.5) AH13(-2,-5.5) AH15(-1,-5.5) AH17(0,-5.5) AH19(1,-5.5) AH21(2,-5.5) AH23(3,-5.5) AH25(4,-5.5) AH27(5,-5.5) AH32(7.5,-5.5) AH33(8,-5.5) AJ1(-8,-6) AJ2(-7.5,-6) AJ3(-7,-6) AJ4(-6.5,-6) AJ5(-6,-6) AJ7(-5,-6) AJ9(-4,-6) AJ11(-3,-6) AJ13(-2,-6) AJ15(-1,-6) AJ17(0,-6) AJ19(1,-6) AJ21(2,-6) AJ23(3,-6) AJ25(4,-6) AJ27(5,-6) AJ30(6.5,-6) AJ31(7,-6) AJ32(7.5,-6) AJ33(8,-6) AK1(-8,-6.5) AK2(-7.5,-6.5) AK5(-6,-6.5) AK7(-5,-6.5) AK9(-4,-6.5) AK11(-3,-6.5) AK13(-2,-6.5) AK15(-1,-6.5) AK17(0,-6.5) AK19(1,-6.5) AK21(2,-6.5) AK23(3,-6.5) AK25(4,-6.5) AK27(5,-6.5) AK29(6,-6.5) AK32(7.5,-6.5) AK33(8,-6.5) AL1(-8,-7) AL2(-7.5,-7) AL3(-7,-7) AL5(-6,-7) AL7(-5,-7) AL9(-4,-7) AL11(-3,-7) AL12(-2.5,-7) AL13(-2,-7) AL14(-1.5,-7) AL15(-1,-7) AL16(-0.5,-7) AL17(0,-7) AL19(1,-7) AL21(2,-7) AL23(3,-7) AL25(4,-7) AL27(5,-7) AL29(6,-7) AL31(7,-7) AL32(7.5,-7) AL33(8,-7) AM1(-8,-7.5) AM2(-7.5,-7.5) AM3(-7,-7.5) AM4(-6.5,-7.5) AM5(-6,-7.5) AM6(-5.5,-7.5) AM7(-5,-7.5) AM8(-4.5,-7.5) AM9(-4,-7.5) AM10(-3.5,-7.5) AM11(-3,-7.5) AM12(-2.5,-7.5) AM13(-2,-7.5) AM14(-1.5,-7.5) AM15(-1,-7.5) AM16(-0.5,-7.5) AM17(0,-7.5) AM18(0.5,-7.5) AM19(1,-7.5) AM20(1.5,-7.5) AM21(2,-7.5) AM22(2.5,-7.5) AM23(3,-7.5) AM24(3.5,-7.5) AM25(4,-7.5) AM26(4.5,-7.5) AM27(5,-7.5) AM28(5.5,-7.5) AM29(6,-7.5) AM30(6.5,-7.5) AM31(7,-7.5) AM32(7.5,-7.5) AM33(8,-7.5) AN1(-8,-8) AN2(-7.5,-8) AN3(-7,-8) AN4(-6.5,-8) AN5(-6,-8) AN6(-5.5,-8) AN7(-5,-8) AN8(-4.5,-8) AN9(-4,-8) AN10(-3.5,-8) AN11(-3,-8) AN13(-2,-8) AN15(-1,-8) AN17(0,-8) AN18(0.5,-8) AN19(1,-8) AN20(1.5,-8) AN21(2,-8) AN22(2.5,-8) AN23(3,-8) AN24(3.5,-8) AN25(4,-8) AN26(4.5,-8) AN27(5,-8) AN28(5.5,-8) AN29(6,-8) AN30(6.5,-8) AN31(7,-8) AN32(7.5,-8) AN33(8,-8) B1(-8,7.5) B2(-7.5,7.5) B3(-7,7.5) B4(-6.5,7.5) B5(-6,7.5) B6(-5.5,7.5) B7(-5,7.5) B8(-4.5,7.5) B9(-4,7.5) B10(-3.5,7.5) B11(-3,7.5) B12(-2.5,7.5) B13(-2,7.5) B14(-1.5,7.5) B15(-1,7.5) B16(-0.5,7.5) B17(0,7.5) B18(0.5,7.5) B19(1,7.5) B20(1.5,7.5) B21(2,7.5) B22(2.5,7.5) B23(3,7.5) B24(3.5,7.5) B25(4,7.5) B26(4.5,7.5) B27(5,7.5) B28(5.5,7.5) B29(6,7.5) B30(6.5,7.5) B31(7,7.5) B32(7.5,7.5) B33(8,7.5) C1(-8,7) C2(-7.5,7) C3(-7,7) C4(-6.5,7) C6(-5.5,7) C7(-5,7) C8(-4.5,7) C9(-4,7) C10(-3.5,7) C11(-3,7) C12(-2.5,7) C13(-2,7) C14(-1.5,7) C15(-1,7) C16(-0.5,7) C17(0,7) C18(0.5,7) C19(1,7) C20(1.5,7) C21(2,7) C22(2.5,7) C23(3,7) C24(3.5,7) C25(4,7) C26(4.5,7) C27(5,7) C28(5.5,7) C29(6,7) C30(6.5,7) C31(7,7) C32(7.5,7) C33(8,7) D1(-8,6.5) D2(-7.5,6.5) D6(-5.5,6.5) D8(-4.5,6.5) D10(-3.5,6.5) D12(-2.5,6.5) D14(-1.5,6.5) D16(-0.5,6.5) D18(0.5,6.5) D20(1.5,6.5) D22(2.5,6.5) D24(3.5,6.5) D26(4.5,6.5) D28(5.5,6.5) D32(7.5,6.5) D33(8,6.5) E1(-8,6) E2(-7.5,6) E3(-7,6) E4(-6.5,6) E5(-6,6) E6(-5.5,6) E8(-4.5,6) E10(-3.5,6) E12(-2.5,6) E14(-1.5,6) E16(-0.5,6) E18(0.5,6) E20(1.5,6) E22(2.5,6) E24(3.5,6) E26(4.5,6) E28(5.5,6) E29(6,6) E30(6.5,6) E31(7,6) E32(7.5,6) E33(8,6) F1(-8,5.5) F2(-7.5,5.5) F6(-5.5,5.5) F8(-4.5,5.5) F10(-3.5,5.5) F12(-2.5,5.5) F14(-1.5,5.5) F16(-0.5,5.5) F18(0.5,5.5) F20(1.5,5.5) F22(2.5,5.5) F24(3.5,5.5) F26(4.5,5.5) F28(5.5,5.5) F32(7.5,5.5) F33(8,5.5) G1(-8,5) G2(-7.5,5) G3(-7,5) G4(-6.5,5) G5(-6,5) G6(-5.5,5) G8(-4.5,5) G10(-3.5,5) G12(-2.5,5) G14(-1.5,5) G16(-0.5,5) G18(0.5,5) G20(1.5,5) G22(2.5,5) G24(3.5,5) G26(4.5,5) G28(5.5,5) G29(6,5) G30(6.5,5) G31(7,5) G32(7.5,5) G33(8,5) H2(-7.5,4.5) H3(-7,4.5) H24(3.5,4.5) H31(7,4.5) H32(7.5,4.5) J1(-8,4) J2(-7.5,4) J3(-7,4) J4(-6.5,4) J5(-6,4) J6(-5.5,4) J7(-5,4) J9(-4,4) J10(-3.5,4) J12(-2.5,4) J13(-2,4) J15(-1,4) J16(-0.5,4) J17(0,4) J18(0.5,4) J19(1,4) J21(2,4) J22(2.5,4) J23(3,4) J26(4.5,4) J28(5.5,4) J29(6,4) J30(6.5,4) J31(7,4) J32(7.5,4) J33(8,4) K2(-7.5,3.5) K3(-7,3.5) K9(-4,3.5) K10(-3.5,3.5) K11(-3,3.5) K12(-2.5,3.5) K13(-2,3.5) K15(-1,3.5) K16(-0.5,3.5) K19(1,3.5) K21(2,3.5) K22(2.5,3.5) K24(3.5,3.5) K25(4,3.5) K26(4.5,3.5) K31(7,3.5) K32(7.5,3.5) L1(-8,3) L2(-7.5,3) L3(-7,3) L4(-6.5,3) L5(-6,3) L6(-5.5,3) L7(-5,3) L9(-4,3) L10(-3.5,3) L12(-2.5,3) L13(-2,3) L15(-1,3) L16(-0.5,3) L17(0,3) L18(0.5,3) L19(1,3) L21(2,3) L22(2.5,3) L24(3.5,3) L26(4.5,3) L27(5,3) L28(5.5,3) L29(6,3) L30(6.5,3) L31(7,3) L32(7.5,3) L33(8,3) M2(-7.5,2.5) M3(-7,2.5) M10(-3.5,2.5) M13(-2,2.5) M16(-0.5,2.5) M18(0.5,2.5) M19(1,2.5) M21(2,2.5) M22(2.5,2.5) M31(7,2.5) M32(7.5,2.5) N1(-8,2) N2(-7.5,2) N3(-7,2) N4(-6.5,2) N5(-6,2) N6(-5.5,2) N7(-5,2) N9(-4,2) N10(-3.5,2) N12(-2.5,2) N13(-2,2) N15(-1,2) N18(0.5,2) N19(1,2) N21(2,2) N22(2.5,2) N24(3.5,2) N26(4.5,2) N27(5,2) N28(5.5,2) N29(6,2) N30(6.5,2) N31(7,2) N32(7.5,2) N33(8,2) P2(-7.5,1.5) P3(-7,1.5) P9(-4,1.5) P11(-3,1.5) P13(-2,1.5) P16(-0.5,1.5) P18(0.5,1.5) P19(1,1.5) P21(2,1.5) P22(2.5,1.5) P24(3.5,1.5) P31(7,1.5) P32(7.5,1.5) R1(-8,1) R2(-7.5,1) R3(-7,1) R4(-6.5,1) R5(-6,1) R6(-5.5,1) R7(-5,1) R11(-3,1) R13(-2,1) R15(-1,1) R17(0,1) R18(0.5,1) R19(1,1) R22(2.5,1) R24(3.5,1) R26(4.5,1) R27(5,1) R28(5.5,1) R29(6,1) R30(6.5,1) R31(7,1) R32(7.5,1) R33(8,1) T2(-7.5,0.5) T3(-7,0.5) T9(-4,0.5) T11(-3,0.5) T13(-2,0.5) T15(-1,0.5) T16(-0.5,0.5) T18(0.5,0.5) T19(1,0.5) T21(2,0.5) T22(2.5,0.5) T24(3.5,0.5) T31(7,0.5) T32(7.5,0.5) U1(-8,0) U2(-7.5,0) U3(-7,0) U4(-6.5,0) U5(-6,0) U6(-5.5,0) U7(-5,0) U8(-4.5,0) U10(-3.5,0) U12(-2.5,0) U13(-2,0) U14(-1.5,0) U16(-0.5,0) U18(0.5,0) U19(1,0) U21(2,0) U22(2.5,0) U25(4,0) U26(4.5,0) U27(5,0) U28(5.5,0) U29(6,0) U30(6.5,0) U31(7,0) U32(7.5,0) U33(8,0) V2(-7.5,-0.5) V3(-7,-0.5) V18(0.5,-0.5) V19(1,-0.5) V31(7,-0.5) V32(7.5,-0.5) W1(-8,-1) W2(-7.5,-1) W3(-7,-1) W4(-6.5,-1) W5(-6,-1) W6(-5.5,-1) W7(-5,-1) W9(-4,-1) W10(-3.5,-1) W12(-2.5,-1) W13(-2,-1) W15(-1,-1) W16(-0.5,-1) W19(1,-1) W21(2,-1) W22(2.5,-1) W23(3,-1) W24(3.5,-1) W25(4,-1) W27(5,-1) W28(5.5,-1) W29(6,-1) W30(6.5,-1) W31(7,-1) W32(7.5,-1) W33(8,-1) Y2(-7.5,-1.5) Y3(-7,-1.5) Y9(-4,-1.5) Y10(-3.5,-1.5) Y12(-2.5,-1.5) Y13(-2,-1.5) Y15(-1,-1.5) Y18(0.5,-1.5) Y19(1,-1.5) Y21(2,-1.5) Y22(2.5,-1.5) Y23(3,-1.5) Y24(3.5,-1.5) Y26(4.5,-1.5) Y31(7,-1.5) Y32(7.5,-1.5)
